# Altium PCB Switch_Matrix_32_2.PCBDOC (part 1 of 9)
Units mm, origin at the board's own origin, x right, y up, seen from the top; angles counter-clockwise.
Board outline 222.54 x 100 mm, 6 copper layers (L1, P2, L3, P4, L5, L6), stack 1.61 mm thick; 629 components, 583 nets, 2332 pads, 825 vias.
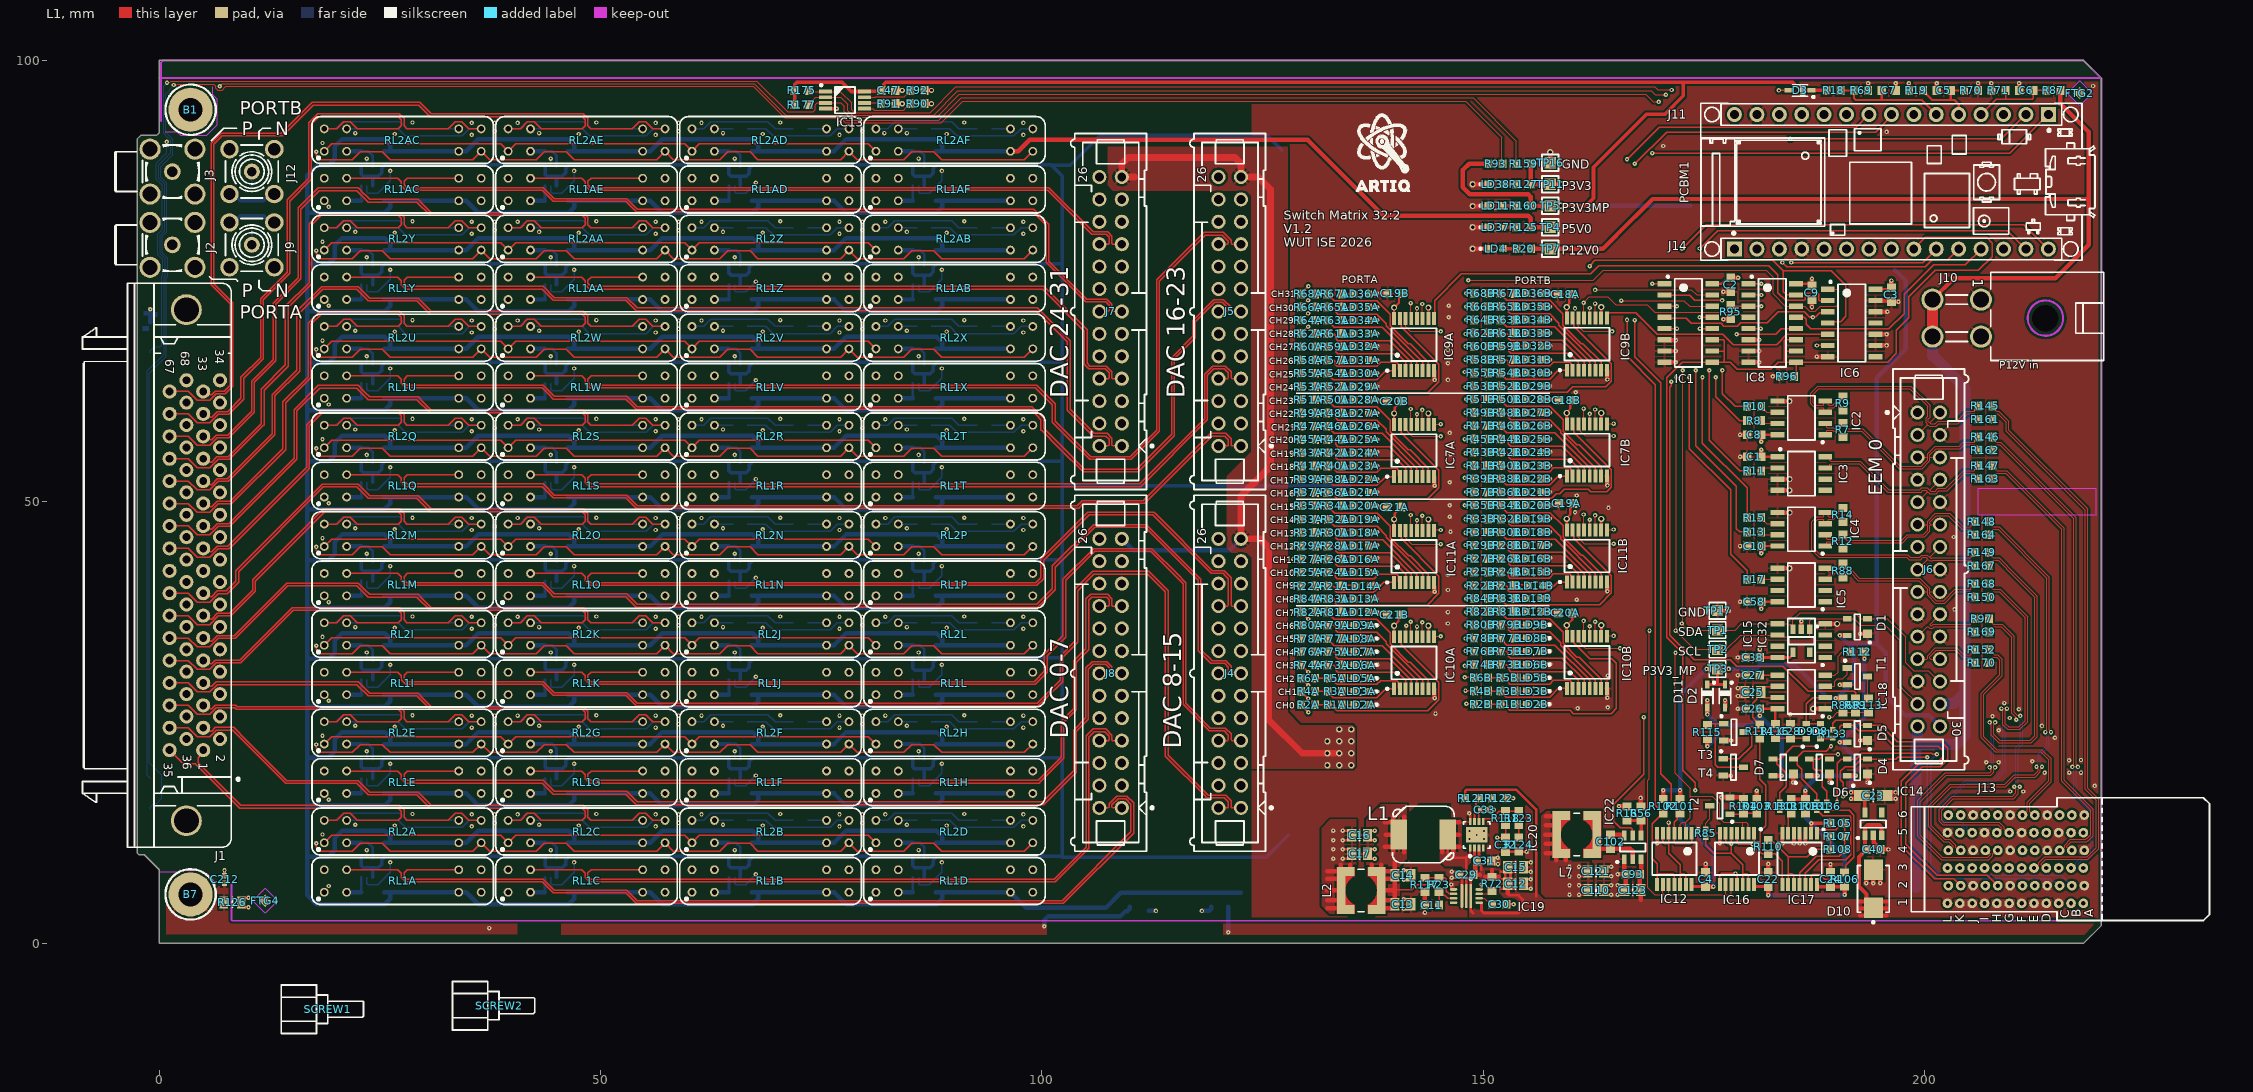
[diagram p0: L1 view]
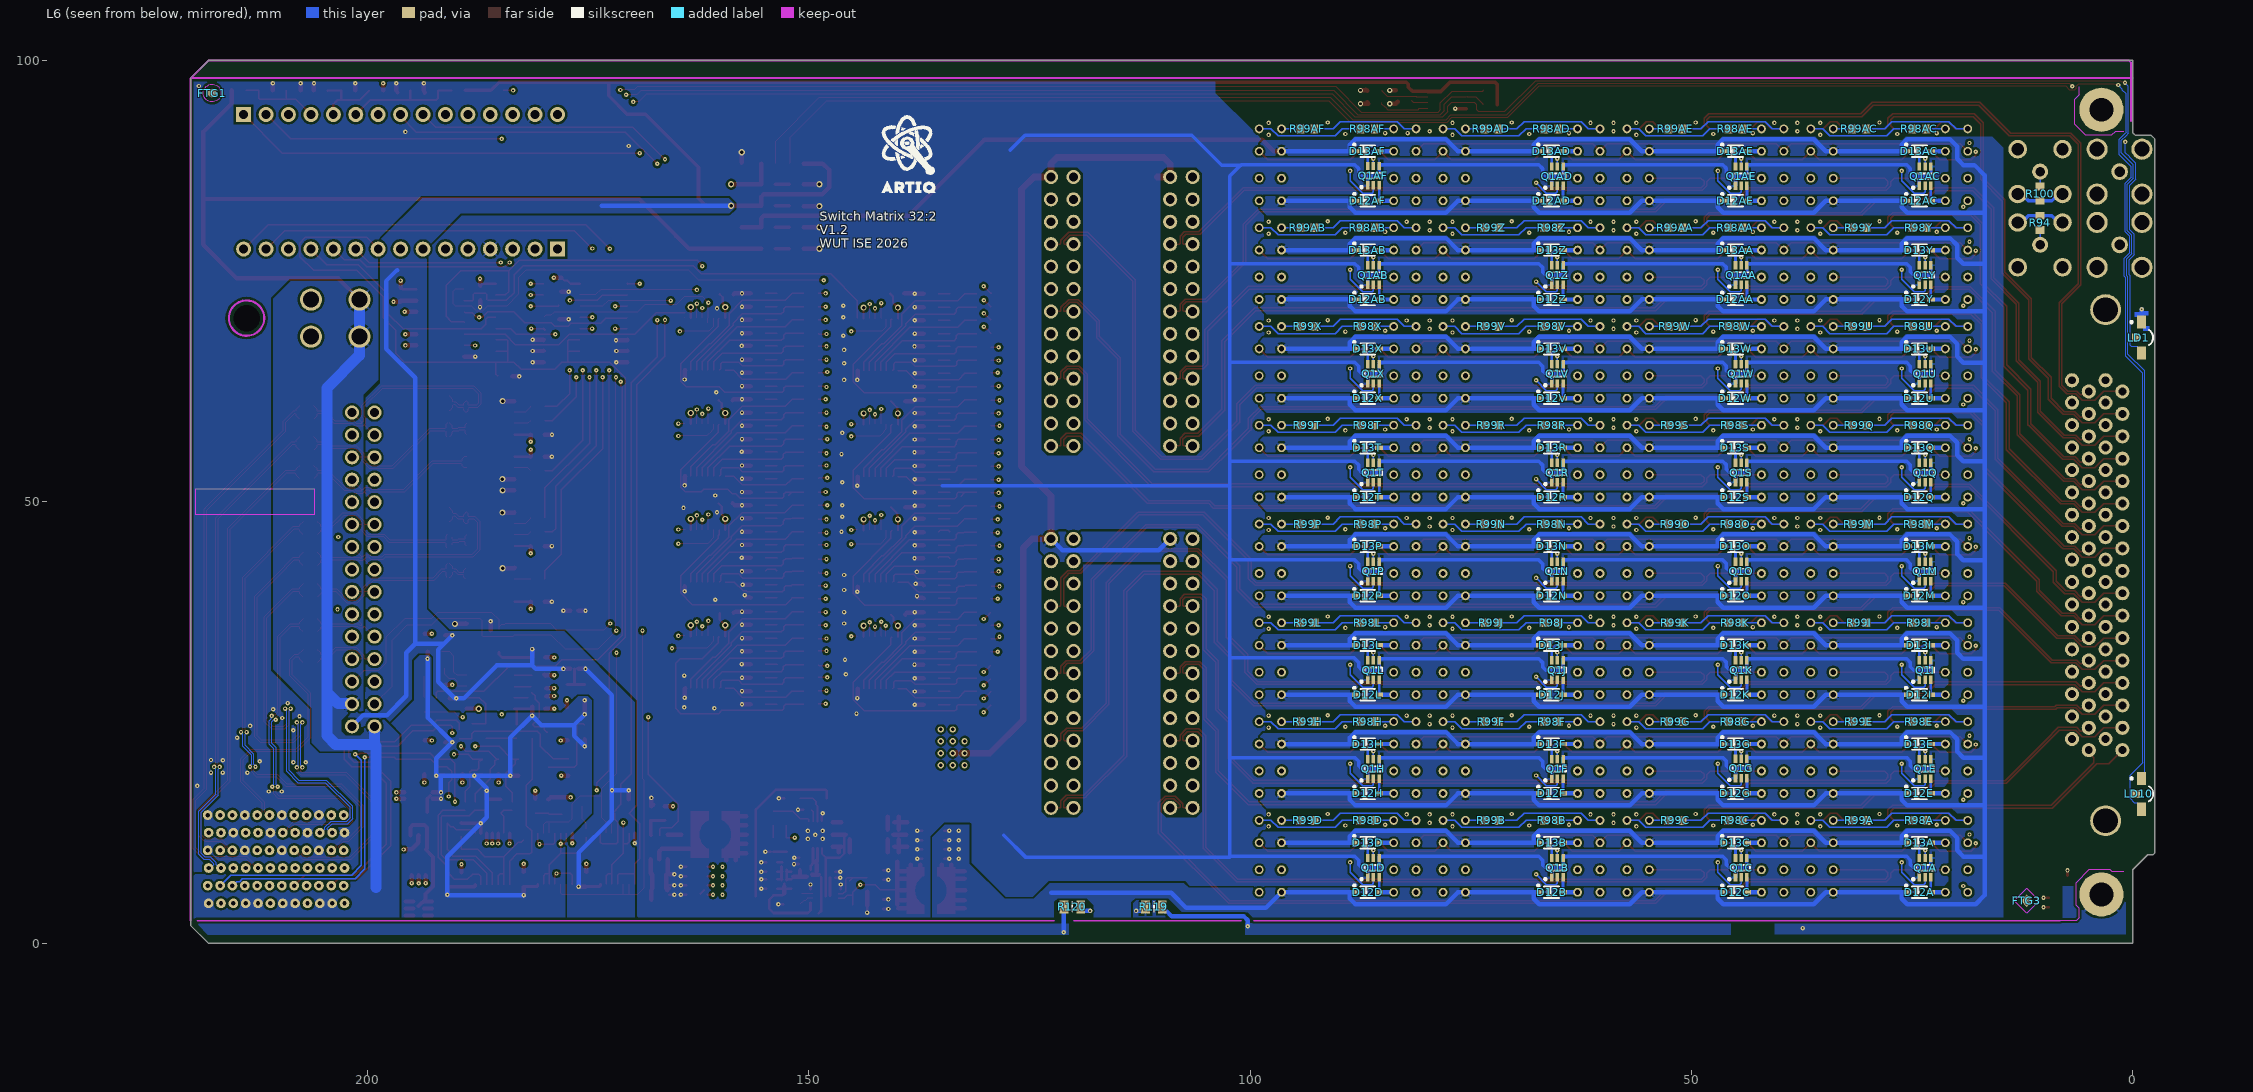
[diagram p1: L6 view, seen from below]
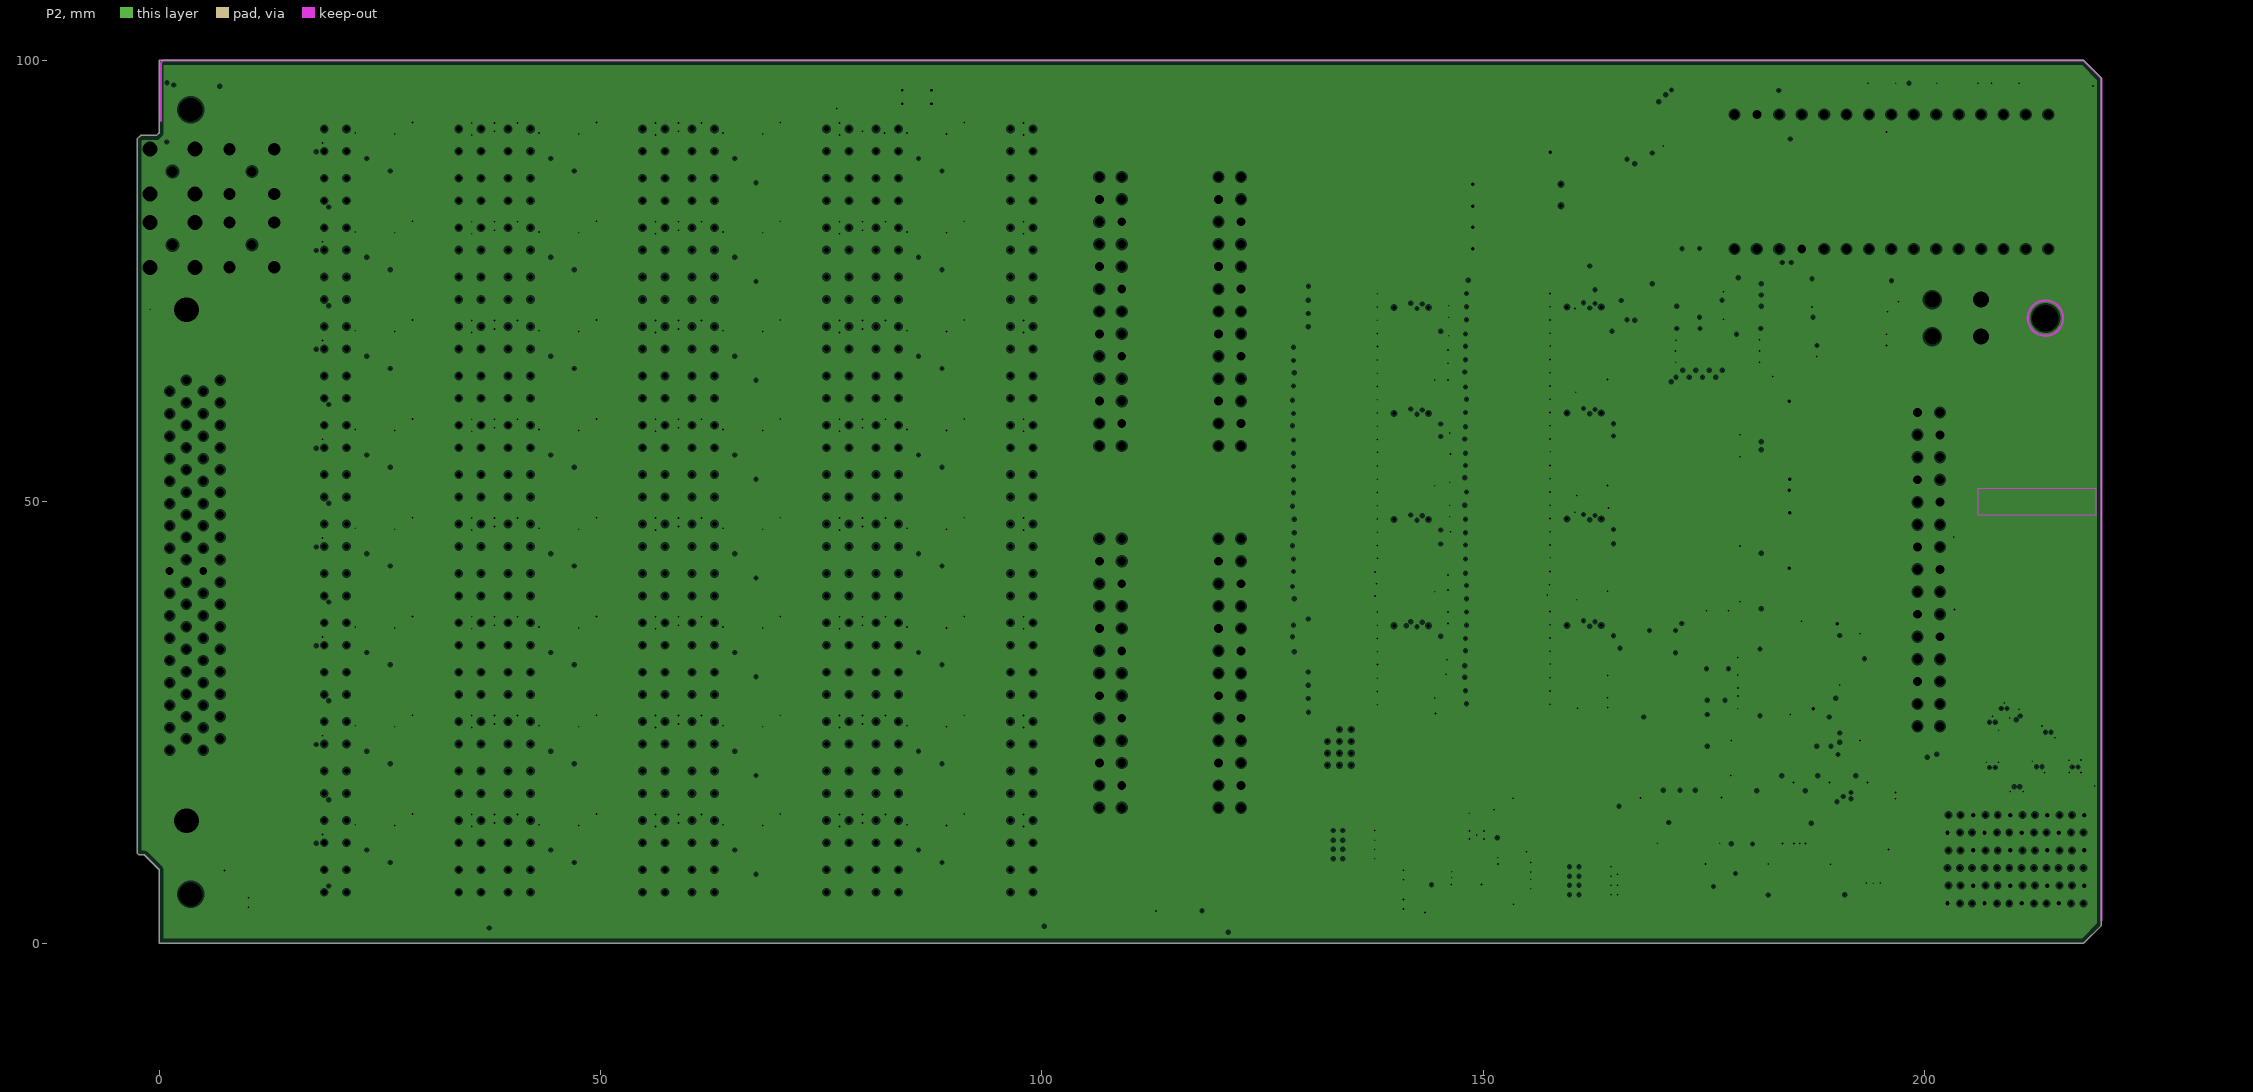
[diagram p2: P2, clearances drawn from the general rule]
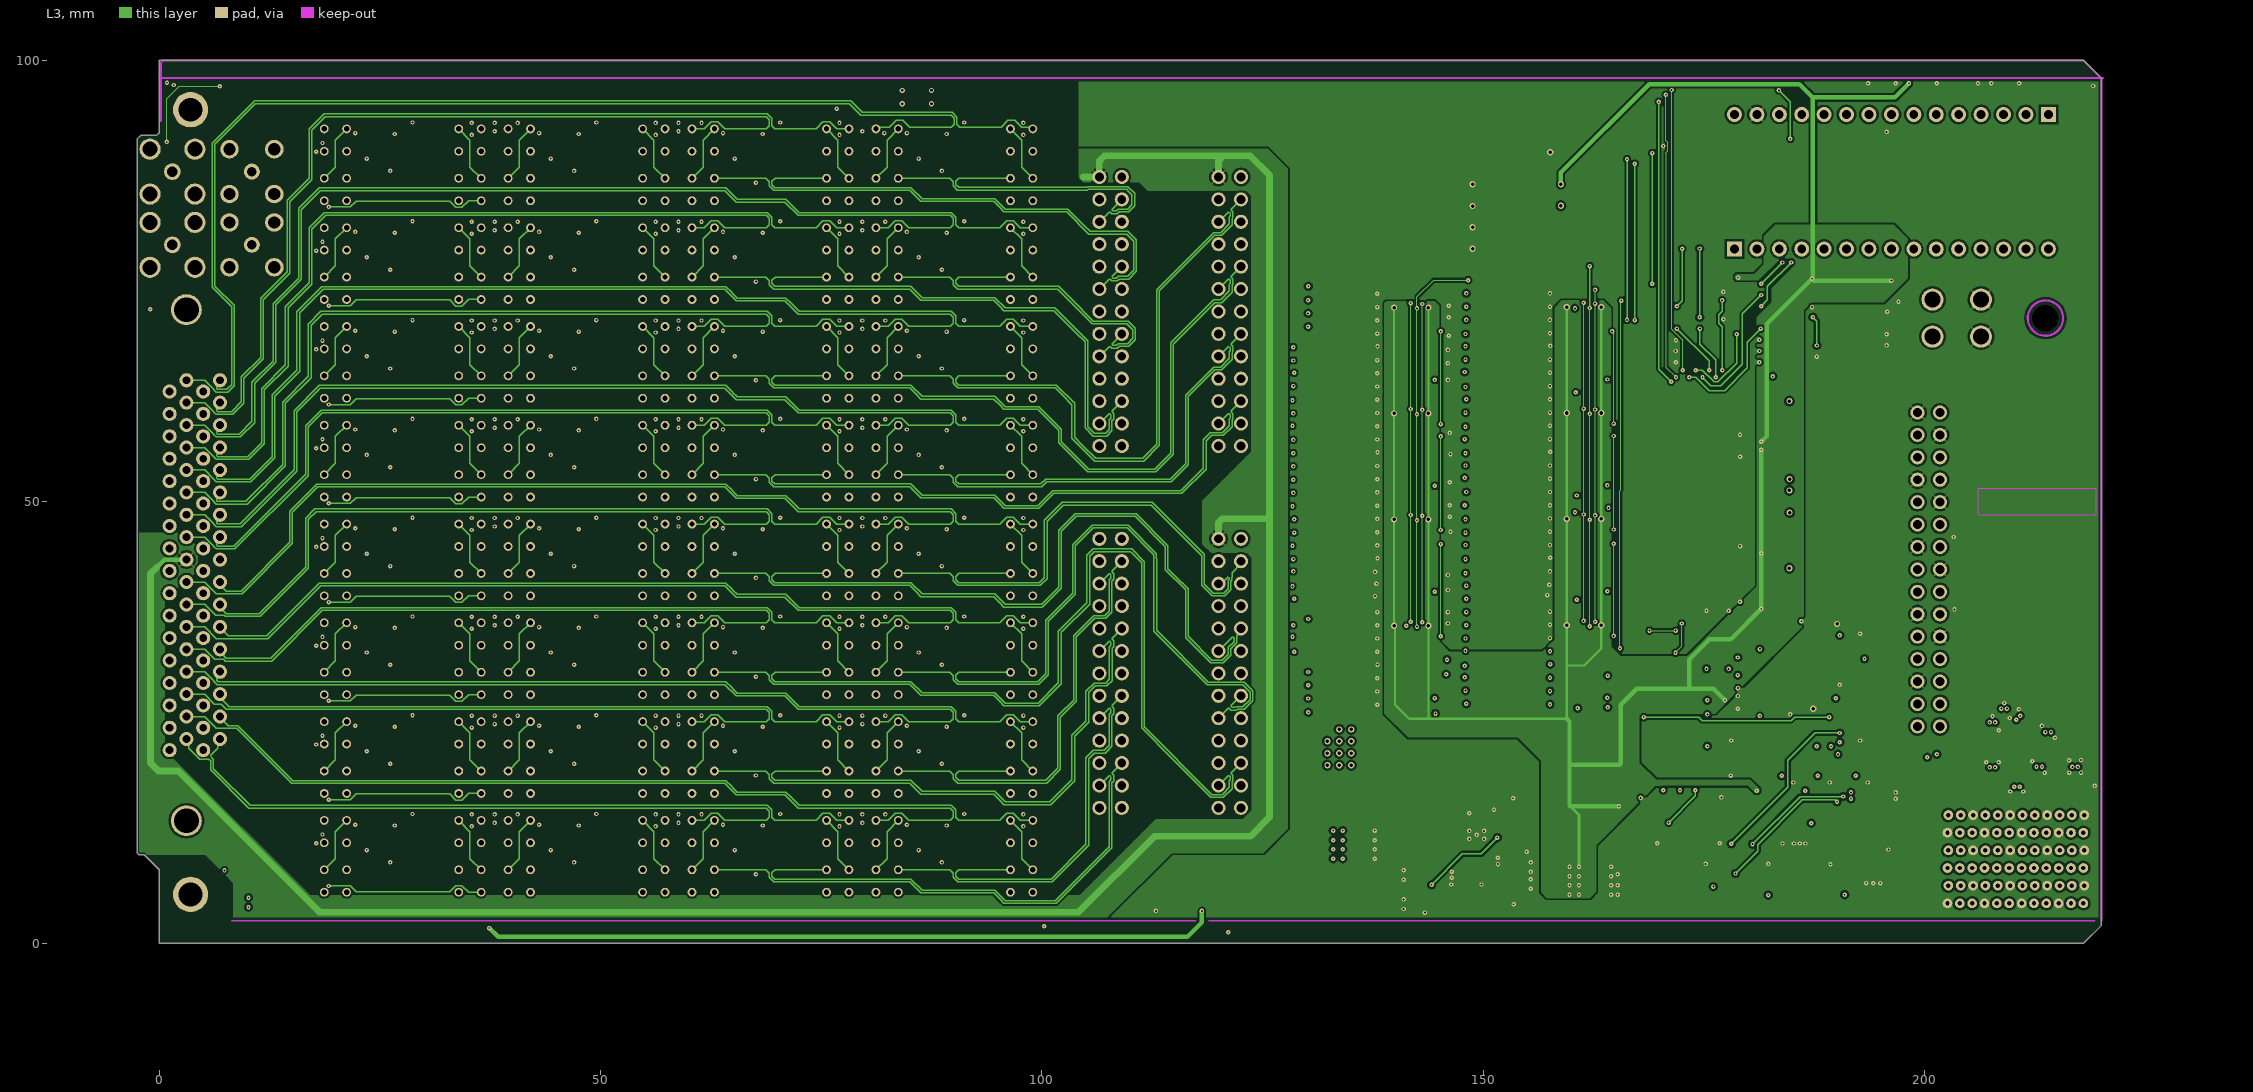
[diagram p3: L3]
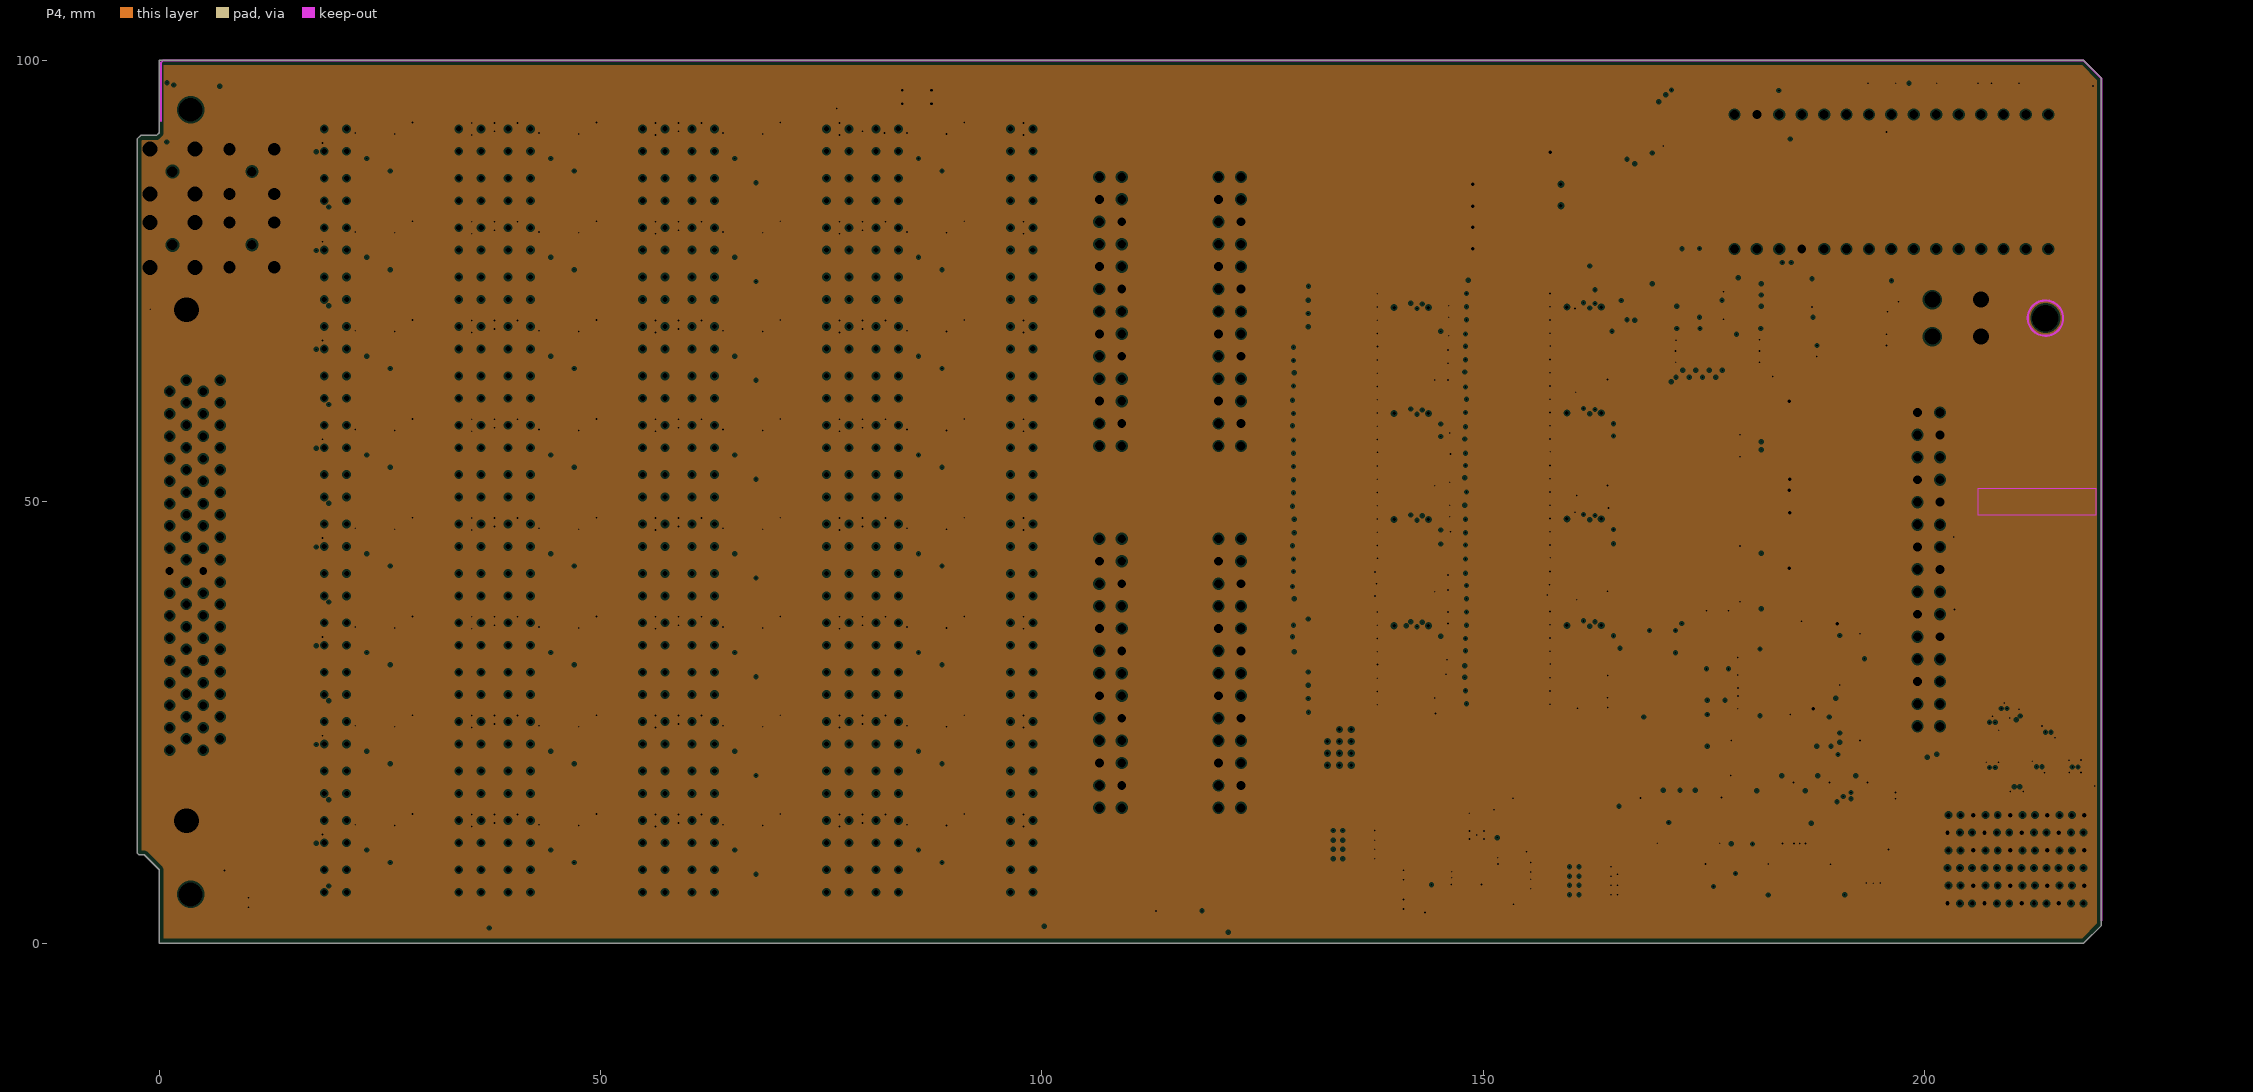
[diagram p4: P4, clearances drawn from the general rule]
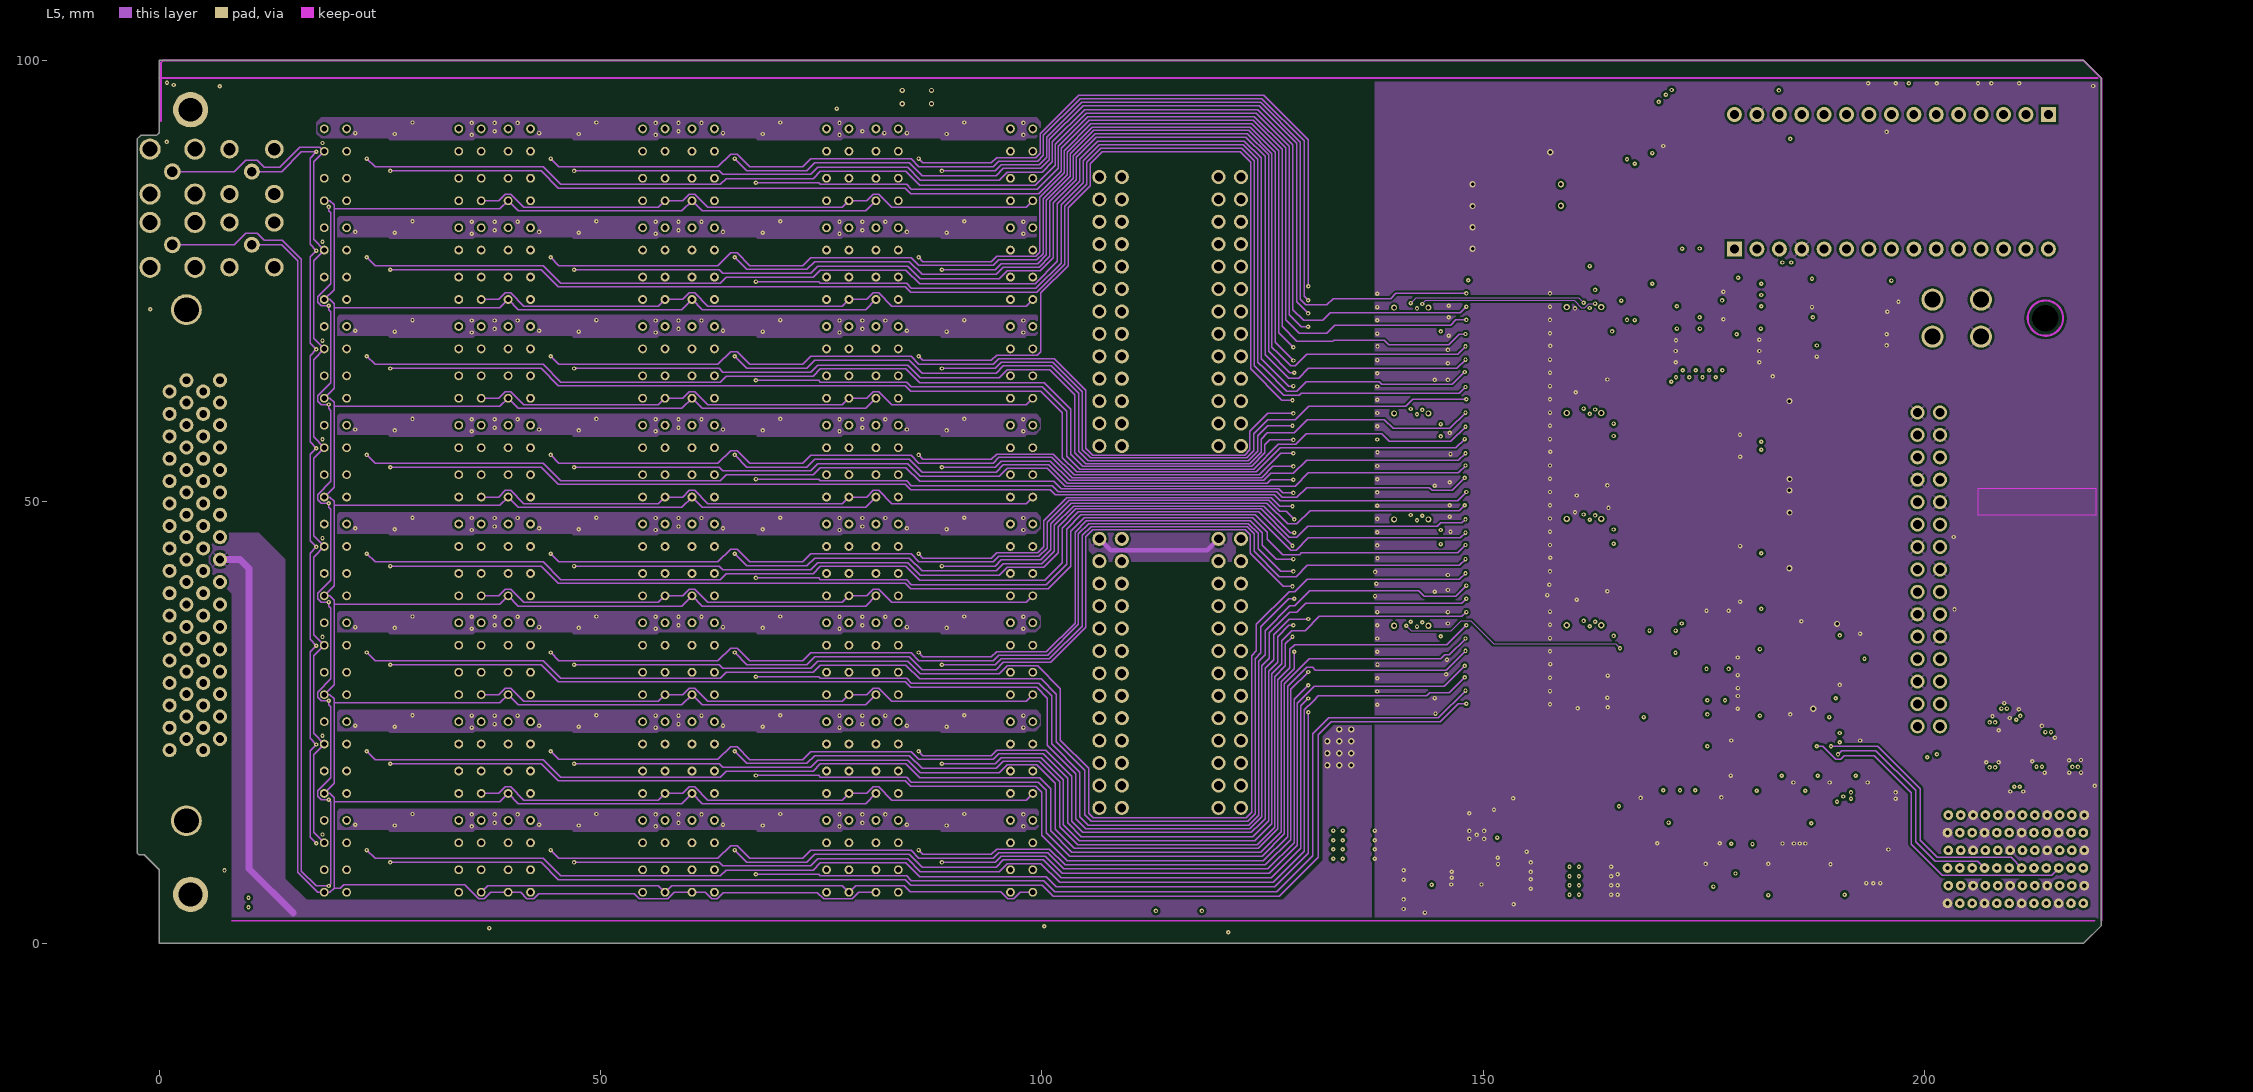
[diagram p5: L5]
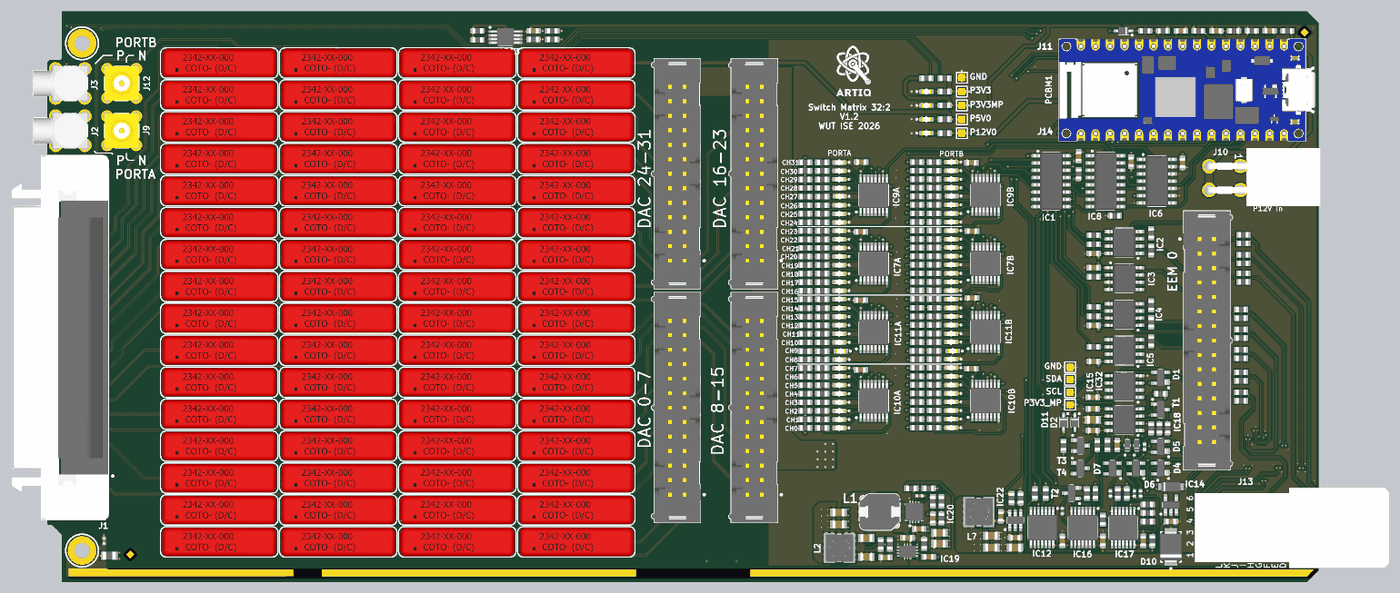
[diagram p13: 3D render of the assembled board from above, using the file's embedded part models]
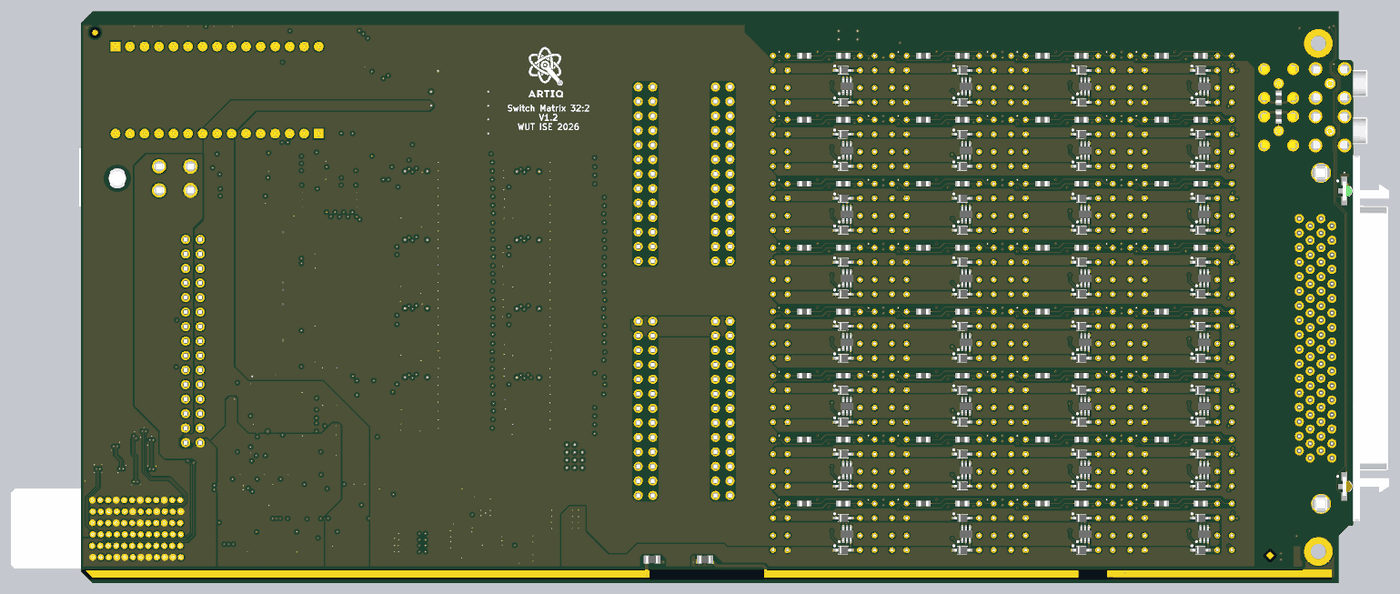
[diagram p14: 3D render of the assembled board from below, using the file's embedded part models]

## Layer stack, top to bottom
TopSolder: solder mask 0.01, Solder Resist, Dk 3.5
L1: signal copper 0.035
Dielectric1: core 0.2, FR-4, Dk 4.8
P2: plane copper 0.035, net GND
Dielectric 1: prepreg 0.4, PP-006, Dk 4.1
L3: signal copper 0.035
Dielectric 2: core 0.2, PP-006, Dk 4.1
P4: plane copper 0.035, net GND
Dielectric2: prepreg 0.4, Core-042, Dk 4.6
L5: signal copper 0.035
Dielectric3: core 0.2, FR-4, Dk 4.8
L6: signal copper 0.035
BottomSolder: solder mask 0.01, Solder Resist, Dk 3.5

## Board outline
-0.4,8.7 -1.7,10 -2.3,10 -2.5,10.2 -2.5,91.1 -2.1,91.5 -0.3,91.5 0,91.8 0,100 218.039,100 220.039,98 220.039,2 218.039,0 0,0 0,8.3

## Design rules (kind name [scope] priority, off if disabled: settings)
AcuteAngle [All] p1: minimum=4.50000000000000E+0001 checktracksonly=FALSE
BoardOutlineClearance [(OnSignal or OnPlane) and not (IsComponent)] p1: gap=0.254 ignorepadtopadclearanceinfootprint=FALSE except(0: Arc-SplitContinuation Track-SplitContinuation SMDPad-SplitContinuation THPad-SplitContinuation Via-SplitContinuation Fill-SplitContinuation Poly-SplitContinuation Region-SplitContinuation Text-SplitContinuation)
Clearance Clearance_LVDS [InNetClass('LVDS')] p1: gap=0.127 ignorepadtopadclearanceinfootprint=FALSE except(0.4: Arc-Poly Track-Poly SMDPad-Poly THPad-Poly Fill-Poly Poly-Poly)
Clearance Clearance_balancing [InNamedPolygon('balancing')] p2: gap=1.27 ignorepadtopadclearanceinfootprint=FALSE except(0.635: Via-Via Via-Fill Via-Poly Via-Region Via-Text Via-Hole)
Clearance [All] p3: gap=0.127 ignorepadtopadclearanceinfootprint=FALSE except(0: Arc-Hole Track-Hole SMDPad-Hole THPad-Hole Via-Hole Fill-Hole Poly-Hole Region-Hole Text-Hole; 0.254: Arc-Poly Track-Poly SMDPad-Poly THPad-Poly Via-Poly Fill-Poly Poly-Poly)
ComponentClearance ComponentClearance_EEprom [InComponent('IC32') vs InComponent('IC15')] p1: gap=-20 collisioncheckmode=3 verticalgap=-20 showdistances=FALSE
ComponentClearance [not ((IsFree and OnLayer('Mechanical13')) or (HasFootprint('PCBM_ARDUINO NANO RP2040'))) vs not ((IsFree and OnLayer('Mechanical13')) or (HasFootprint('PCBM_ARDUINO NANO RP2040')))] p2: gap=0.025 collisioncheckmode=3 verticalgap=0.025 showdistances=FALSE
DiffPairsRouting [All] p1: maxlimit=0.152 minlimit=0.127 mostfreqgap=0.152 toplayer_minwidth=0.127 toplayer_maxwidth=0.152 toplayer_prefwidth=0.152 midlayer1_minwidth=0.127 midlayer1_maxwidth=0.152 midlayer1_prefwidth=0.152 midlayer2_minwidth=0.127 midlayer2_maxwidth=0.152 midlayer2_prefwidth=0.152 bottomlayer_minwidth=0.127 bottomlayer_maxwidth=0.152 bottomlayer_prefwidth=0.152 maxuncoupledlength=12.7
FabricationTestPointUsage TestPointUsage [All] p1: valid=0 allowmultiple=FALSE
FabricationTestpoint Testpoint [All] p1: side=3 testpointundercomponent=TRUE minsize=1.016 maxsize=2.54 preferedsize=1.524 minholesize=0.508 maxholesize=1.016 preferedholesize=0.813 testpointgrid=0.025 allowsidetop=TRUE allowsidebottom=TRUE usegrid=TRUE gridtolerance=0
Height [All] p1: minheight=0 maxheight=40 prefheight=40
HoleSize [All] p1: absolutevalues=TRUE maxlimit=3.81 minlimit=0.025 maxpercent=80.000 minpercent=20.000
HoleToHoleClearance [All] p1: gap=0.025 allowstackedmicrovias=TRUE
MinimumSolderMaskSliver [All] p1: minsoldermaskwidth=0
PlaneClearance [All] p1: clearance=0.2
PlaneConnect [All] p1: planeconnectstyle=Direct reliefexpansion=0.508 reliefentries=4 reliefconductorwidth=0.254 reliefairgap=0.254
PolygonConnect PolygonConnect_Pressfit [HasFootprint('AMPHENOL_10052825-101LF')] p1: connectstyle=Direct reliefconductorwidth=0.254 reliefentries=4 polygonreliefangle="45 Angle" airgapwidth=0.254
PolygonConnect PolygonConnect_1 [All] p2: thpad.connectstyle=Relief thpad.reliefconductorwidth=0.254 thpad.reliefentries=4 thpad.polygonreliefangle="45 Angle" thpad.airgapwidth=0.254 smdpad.connectstyle=Relief smdpad.reliefconductorwidth=0.254 smdpad.reliefentries=4 smdpad.polygonreliefangle="90 Angle" smdpad.airgapwidth=0.254 via.connectstyle=Direct via.reliefconductorwidth=0.254 via.reliefentries=4 via.polygonreliefangle="45 Angle" via.airgapwidth=0.254
RoomDefinition Relay_channel31 [InComponentClass('Relay_channel31')] p1 off: confinementstyle=ConfineIn formatcopy=TRUE lockcomponents=FALSE outline 37.5,82.1 58.9,82.1 58.9,93.8 37.5,93.8
RoomDefinition U_DIOT_Connectors_P1_P6 [InComponentClass('U_DIOT_Connectors_P1_P6')] p2 off: confinementstyle=ConfineIn formatcopy=TRUE lockcomponents=FALSE outline 187.4,0.7 220.7,0.7 220.7,65.3 187.4,65.3
RoomDefinition Switch_Matrix_32_2 [InComponentClass('Switch_Matrix_32_2')] p3 off: confinementstyle=ConfineIn formatcopy=TRUE lockcomponents=FALSE outline 9.75,7.75 13.75,7.75 13.75,3.75 9.75,3.75
RoomDefinition Relay_channel32 [InComponentClass('Relay_channel32')] p4 off: confinementstyle=ConfineIn formatcopy=TRUE lockcomponents=FALSE outline 79.2,82.1 100.6,82.1 100.6,93.8 79.2,93.8
RoomDefinition Relay_channel30 [InComponentClass('Relay_channel30')] p5 off: confinementstyle=ConfineIn formatcopy=TRUE lockcomponents=FALSE outline 58.3,82.1 79.7,82.1 79.7,93.8 58.3,93.8
RoomDefinition Relay_channel29 [InComponentClass('Relay_channel29')] p6 off: confinementstyle=ConfineIn formatcopy=TRUE lockcomponents=FALSE outline 16.7,82.1 38,82.1 38,93.8 16.7,93.8
RoomDefinition Relay_channel28 [InComponentClass('Relay_channel28')] p7 off: confinementstyle=ConfineIn formatcopy=TRUE lockcomponents=FALSE outline 79.2,70.9 100.6,70.9 100.6,82.6 79.2,82.6
RoomDefinition Relay_channel27 [InComponentClass('Relay_channel27')] p8 off: confinementstyle=ConfineIn formatcopy=TRUE lockcomponents=FALSE outline 37.5,70.9 58.9,70.9 58.9,82.6 37.5,82.6
RoomDefinition Relay_channel26 [InComponentClass('Relay_channel26')] p9 off: confinementstyle=ConfineIn formatcopy=TRUE lockcomponents=FALSE outline 58.3,70.9 79.7,70.9 79.7,82.6 58.3,82.6
RoomDefinition Relay_channel25 [InComponentClass('Relay_channel25')] p10 off: confinementstyle=ConfineIn formatcopy=TRUE lockcomponents=FALSE outline 16.7,70.9 38,70.9 38,82.6 16.7,82.6
RoomDefinition Relay_channel24 [InComponentClass('Relay_channel24')] p11 off: confinementstyle=ConfineIn formatcopy=TRUE lockcomponents=FALSE outline 79.2,59.7 100.6,59.7 100.6,71.4 79.2,71.4
RoomDefinition Relay_channel23 [InComponentClass('Relay_channel23')] p12 off: confinementstyle=ConfineIn formatcopy=TRUE lockcomponents=FALSE outline 37.5,59.7 58.9,59.7 58.9,71.4 37.5,71.4
RoomDefinition Relay_channel22 [InComponentClass('Relay_channel22')] p13 off: confinementstyle=ConfineIn formatcopy=TRUE lockcomponents=FALSE outline 58.3,59.7 79.7,59.7 79.7,71.4 58.3,71.4
RoomDefinition Relay_channel21 [InComponentClass('Relay_channel21')] p14 off: confinementstyle=ConfineIn formatcopy=TRUE lockcomponents=FALSE outline 16.7,59.7 38,59.7 38,71.4 16.7,71.4
RoomDefinition Relay_channel20 [InComponentClass('Relay_channel20')] p15 off: confinementstyle=ConfineIn formatcopy=TRUE lockcomponents=FALSE outline 79.2,48.5 100.6,48.5 100.6,60.2 79.2,60.2
RoomDefinition Relay_channel19 [InComponentClass('Relay_channel19')] p16 off: confinementstyle=ConfineIn formatcopy=TRUE lockcomponents=FALSE outline 37.5,48.5 58.9,48.5 58.9,60.2 37.5,60.2
RoomDefinition Relay_channel18 [InComponentClass('Relay_channel18')] p17 off: confinementstyle=ConfineIn formatcopy=TRUE lockcomponents=FALSE outline 58.3,48.5 79.7,48.5 79.7,60.2 58.3,60.2
RoomDefinition Relay_channel17 [InComponentClass('Relay_channel17')] p18 off: confinementstyle=ConfineIn formatcopy=TRUE lockcomponents=FALSE outline 16.7,48.5 38,48.5 38,60.2 16.7,60.2
RoomDefinition Relay_channel16 [InComponentClass('Relay_channel16')] p19 off: confinementstyle=ConfineIn formatcopy=TRUE lockcomponents=FALSE outline 79.2,37.3 100.6,37.3 100.6,49 79.2,49
RoomDefinition Relay_channel15 [InComponentClass('Relay_channel15')] p20 off: confinementstyle=ConfineIn formatcopy=TRUE lockcomponents=FALSE outline 37.5,37.3 58.9,37.3 58.9,49 37.5,49
RoomDefinition Relay_channel14 [InComponentClass('Relay_channel14')] p21 off: confinementstyle=ConfineIn formatcopy=TRUE lockcomponents=FALSE outline 58.3,37.3 79.7,37.3 79.7,49 58.3,49
RoomDefinition Relay_channel13 [InComponentClass('Relay_channel13')] p22 off: confinementstyle=ConfineIn formatcopy=TRUE lockcomponents=FALSE outline 16.7,37.3 38,37.3 38,49 16.7,49
RoomDefinition Relay_channel12 [InComponentClass('Relay_channel12')] p23 off: confinementstyle=ConfineIn formatcopy=TRUE lockcomponents=FALSE outline 79.2,26.1 100.6,26.1 100.6,37.9 79.2,37.9
RoomDefinition Relay_channel11 [InComponentClass('Relay_channel11')] p24 off: confinementstyle=ConfineIn formatcopy=TRUE lockcomponents=FALSE outline 37.5,26.1 58.9,26.1 58.9,37.9 37.5,37.9
RoomDefinition Relay_channel10 [InComponentClass('Relay_channel10')] p25 off: confinementstyle=ConfineIn formatcopy=TRUE lockcomponents=FALSE outline 58.3,26.1 79.7,26.1 79.7,37.9 58.3,37.9
RoomDefinition Relay_channel9 [InComponentClass('Relay_channel9')] p26 off: confinementstyle=ConfineIn formatcopy=TRUE lockcomponents=FALSE outline 16.7,26.1 38,26.1 38,37.9 16.7,37.9
RoomDefinition Relay_channel8 [InComponentClass('Relay_channel8')] p27 off: confinementstyle=ConfineIn formatcopy=TRUE lockcomponents=FALSE outline 79.2,14.9 100.6,14.9 100.6,26.7 79.2,26.7
RoomDefinition Relay_channel7 [InComponentClass('Relay_channel7')] p28 off: confinementstyle=ConfineIn formatcopy=TRUE lockcomponents=FALSE outline 37.5,14.9 58.9,14.9 58.9,26.7 37.5,26.7
RoomDefinition Relay_channel6 [InComponentClass('Relay_channel6')] p29 off: confinementstyle=ConfineIn formatcopy=TRUE lockcomponents=FALSE outline 58.3,14.9 79.7,14.9 79.7,26.7 58.3,26.7
RoomDefinition Relay_channel5 [InComponentClass('Relay_channel5')] p30 off: confinementstyle=ConfineIn formatcopy=TRUE lockcomponents=FALSE outline 16.7,14.9 38,14.9 38,26.7 16.7,26.7
RoomDefinition Relay_channel4 [InComponentClass('Relay_channel4')] p31 off: confinementstyle=ConfineIn formatcopy=TRUE lockcomponents=FALSE outline 79.2,3.7 100.6,3.7 100.6,15.5 79.2,15.5
RoomDefinition Relay_channel3 [InComponentClass('Relay_channel3')] p32 off: confinementstyle=ConfineIn formatcopy=TRUE lockcomponents=FALSE outline 37.5,3.7 58.9,3.7 58.9,15.5 37.5,15.5
RoomDefinition Relay_channel2 [InComponentClass('Relay_channel2')] p33 off: confinementstyle=ConfineIn formatcopy=TRUE lockcomponents=FALSE outline 58.3,3.7 79.7,3.7 79.7,15.5 58.3,15.5
RoomDefinition Relay_channel1 [InComponentClass('Relay_channel1')] p34 off: confinementstyle=ConfineIn formatcopy=TRUE lockcomponents=FALSE outline 16.7,3.7 38,3.7 38,15.5 16.7,15.5
RoomDefinition CTRLB [InComponentClass('CTRLB')] p35 off: confinementstyle=ConfineIn formatcopy=TRUE lockcomponents=FALSE outline 148,26.05 165.5,26.05 165.5,74.6 148,74.6
RoomDefinition CTRLA [InComponentClass('CTRLA')] p36 off: confinementstyle=ConfineIn formatcopy=TRUE lockcomponents=FALSE outline 128.425,26 145.925,26 145.925,74.55 128.425,74.55
RoomDefinition Overlapping [InComponentClass('Overlapping')] p37 off: confinementstyle=ConfineIn formatcopy=TRUE lockcomponents=FALSE outline 104.075,-131.575 -5.375,-131.575 -5.375,-111.025 104.075,-111.025
RoomDefinition U_Switch_Matrix_32_2_Supply [InComponentClass('U_Switch_Matrix_32_2_Supply')] p38 off: confinementstyle=ConfineIn formatcopy=TRUE lockcomponents=FALSE outline 172.2,17.6 207.4,17.6 207.4,1.7 172.2,1.7
RoomDefinition U_Switch_Matrix_32_2_EEM [InComponentClass('U_Switch_Matrix_32_2_EEM')] p39 off: confinementstyle=ConfineIn formatcopy=TRUE lockcomponents=FALSE outline 214,14.7 159.9,14.7 159.9,90.2 214,90.2
RoutingVias RoutingVias_HPWR [InNetClass('Hpower')] p1: holewidth=0.4 width=0.7 viastyle="Through Hole" minholewidth=0.2 minwidth=0.4 maxholewidth=0.711 maxwidth=1.27
RoutingVias [All] p2: holewidth=0.2 width=0.5 viastyle="Through Hole" minholewidth=0.2 minwidth=0.4 maxholewidth=0.711 maxwidth=1.27 useviatemplates=TRUE viatemplateguid#1={0001295C-FF79-4C27-8418-7EFAEB5757D8} viatemplateguid#2={13926838-4983-4471-9819-F5821E9D87EE} viatemplateguid#3={F834FD54-37C4-4248-B22B-F1AB9E1D42DF} viatemplatename#1=v50h20m0mx0 viatemplatename#2=v60h30m0mx0 viatemplatename#3=v70h40m0mx0
SilkToSilkClearance [All] p1: silktosilkclearance=0
SilkToSolderMaskClearance SilkscreenOverComponentPads [IsPad] p1: minsilkscreentomaskgap=0 clearancetoexposedcopper=TRUE
SolderMaskExpansion [All] p1: expansion=0.051 istentingtop=FALSE
SupplyNets "Schematic Supply Nets_9" [InNet('P5V0A')] p1: voltage=0.000
SupplyNets "Schematic Supply Nets_8" [InNet('STRIP1')] p2: voltage=0.000
SupplyNets "Schematic Supply Nets_7" [InNet('P3V3_DIOT')] p3: voltage=0.000
SupplyNets "Schematic Supply Nets_6" [InNet('N13V0_SCSI')] p4: voltage=0.000
SupplyNets "Schematic Supply Nets_5" [InNet('P3V3_MP')] p5: voltage=0.000
SupplyNets "Schematic Supply Nets_4" [InNet('P3V3')] p6: voltage=0.000
SupplyNets "Schematic Supply Nets_3" [InNet('P12V0')] p7: voltage=0.000
SupplyNets "Schematic Supply Nets_2" [InNet('GND')] p8: voltage=0.000
SupplyNets "Schematic Supply Nets" [InNet('P13V0_SCSI')] p9: voltage=0.000
ViasUnderSMD ViasUnderSMD_allow [HasFootprint('QFN50P300X300X80-17N-S175') or  HasFootprint('SOP50P490X110-11N-R168X198')  or  HasFootprint('SON50P300X300X80-11N-R175X248') or HasFootprint('SON50P200X300X80-11N-R94X250') or HasFootprint('CAPMP3216X180N')   or HasFootprint('SON65P200X200X80-7N-R65X145') or HasFootprint('SON45P300X300X80-13N-R175X248') or HasFootprint('SON50P300X300X80-9N-R175X248')] p1: allowed=TRUE
ViasUnderSMD [All] p2: allowed=FALSE
Width Width_HPWR [InNetClass('Hpower')] p1: maxlimit=2 minlimit=0.254 preferedwidth=0.508
Width [All] p2: maxlimit=1.27 minlimit=0.127 preferedwidth=0.127
18 further rules are at their usual default settings.

## Classes and differential pairs
net class ESD_STRIP: STRIP1 STRIP2 STRIP3
net class BP_IO.LVDS_P[0..7]: BP_IO.LVDS_P0 BP_IO.LVDS_P1 BP_IO.LVDS_P2 BP_IO.LVDS_P3 BP_IO.LVDS_P4 BP_IO.LVDS_P5 BP_IO.LVDS_P6 BP_IO.LVDS_P7
net class BP_IO.LVDS_N[0..7]: BP_IO.LVDS_N0 BP_IO.LVDS_N1 BP_IO.LVDS_N2 BP_IO.LVDS_N3 BP_IO.LVDS_N4 BP_IO.LVDS_N5 BP_IO.LVDS_N6 BP_IO.LVDS_N7
component class Overlapping: J13
channel class Switch_Matrix_CTRL: CTRLA CTRLB
net class PWR: P12V0
component class U_DIOT_Connectors_P1_P6: C23 C24 C25 C26 C27 C28 C40 D5 D6 D7 D8 D9 D11 IC14 IC16 IC17 IC18 J13 R85 R97 R103 R104 R105 R106 R107 R108 R109 R110 R111 R112 R113 R114 R115 R116 R130 R131 R133 R136 R145 R146 R147 R148 R149 R150 R152 R161 R162 R163 R164 R167 R168 R169 R170 T1 T2 T3 T4
component class CTRLB: C18B C19B C20B C21B IC7B IC9B IC10B IC11B LD2B LD3B LD5B LD6B LD7B LD8B LD9B LD12B LD13B LD14B LD15B LD16B LD17B LD18B LD19B LD20B LD21B LD22B LD23B LD24B LD25B LD26B LD27B LD28B LD29B LD30B LD31B LD32B LD33B LD34B LD35B LD36B R1B R2B R3B R4B R5B R6B R21B R22B R24B R25B R26B R27B R28B R29B R30B R31B R32B R33B R34B R35B R36B R37B R38B R39B R40B R41B R42B R43B R44B R45B R46B R47B R48B R49B R50B R51B R52B R53B R54B R55B R57B R58B R59B R60B R61B R62B R63B R64B R65B R66B R67B R68B R73B R74B R75B R76B R77B R78B R79B R80B R81B R82B R83B R84B
component class CTRLA: C18A C19A C20A C21A IC7A IC9A IC10A IC11A LD2A LD3A LD5A LD6A LD7A LD8A LD9A LD12A LD13A LD14A LD15A LD16A LD17A LD18A LD19A LD20A LD21A LD22A LD23A LD24A LD25A LD26A LD27A LD28A LD29A LD30A LD31A LD32A LD33A LD34A LD35A LD36A R1A R2A R3A R4A R5A R6A R21A R22A R24A R25A R26A R27A R28A R29A R30A R31A R32A R33A R34A R35A R36A R37A R38A R39A R40A R41A R42A R43A R44A R45A R46A R47A R48A R49A R50A R51A R52A R53A R54A R55A R57A R58A R59A R60A R61A R62A R63A R64A R65A R66A R67A R68A R73A R74A R75A R76A R77A R78A R79A R80A R81A R82A R83A R84A
net class DAC_IN_P[32..1]: DAC_IN_P1 DAC_IN_P2 DAC_IN_P3 DAC_IN_P4 DAC_IN_P5 DAC_IN_P6 DAC_IN_P7 DAC_IN_P8 DAC_IN_P9 DAC_IN_P10 DAC_IN_P11 DAC_IN_P12 DAC_IN_P13 DAC_IN_P14 DAC_IN_P15 DAC_IN_P16 DAC_IN_P17 DAC_IN_P18 DAC_IN_P19 DAC_IN_P20 DAC_IN_P21 DAC_IN_P22 DAC_IN_P23 DAC_IN_P24 DAC_IN_P25 DAC_IN_P26 DAC_IN_P27 DAC_IN_P28 DAC_IN_P29 DAC_IN_P30 DAC_IN_P31 DAC_IN_P32
net class DAC_IN_N[32..1]: DAC_IN_N1 DAC_IN_N2 DAC_IN_N3 DAC_IN_N4 DAC_IN_N5 DAC_IN_N6 DAC_IN_N7 DAC_IN_N8 DAC_IN_N9 DAC_IN_N10 DAC_IN_N11 DAC_IN_N12 DAC_IN_N13 DAC_IN_N14 DAC_IN_N15 DAC_IN_N16 DAC_IN_N17 DAC_IN_N18 DAC_IN_N19 DAC_IN_N20 DAC_IN_N21 DAC_IN_N22 DAC_IN_N23 DAC_IN_N24 DAC_IN_N25 DAC_IN_N26 DAC_IN_N27 DAC_IN_N28 DAC_IN_N29 DAC_IN_N30 DAC_IN_N31 DAC_IN_N32
channel class Relay_channel: Relay_channel1 Relay_channel2 Relay_channel3 Relay_channel4 Relay_channel5 Relay_channel6 Relay_channel7 Relay_channel8 Relay_channel9 Relay_channel10 Relay_channel11 Relay_channel12 Relay_channel13 Relay_channel14 Relay_channel15 Relay_channel16 Relay_channel17 Relay_channel18 Relay_channel19 Relay_channel20 Relay_channel21 Relay_channel22 Relay_channel23 Relay_channel24 Relay_channel25 Relay_channel26 Relay_channel27 Relay_channel28 Relay_channel29 Relay_channel30 Relay_channel31 Relay_channel32
component class Relay_channel32: D12AF D13AF Q1AF R98AF R99AF RL1AF RL2AF
component class Relay_channel31: D12AE D13AE Q1AE R98AE R99AE RL1AE RL2AE
component class Relay_channel30: D12AD D13AD Q1AD R98AD R99AD RL1AD RL2AD
component class Relay_channel29: D12AC D13AC Q1AC R98AC R99AC RL1AC RL2AC
component class Relay_channel28: D12AB D13AB Q1AB R98AB R99AB RL1AB RL2AB
component class Relay_channel27: D12AA D13AA Q1AA R98AA R99AA RL1AA RL2AA
component class Relay_channel26: D12Z D13Z Q1Z R98Z R99Z RL1Z RL2Z
component class Relay_channel25: D12Y D13Y Q1Y R98Y R99Y RL1Y RL2Y
component class Relay_channel24: D12X D13X Q1X R98X R99X RL1X RL2X
component class Relay_channel23: D12W D13W Q1W R98W R99W RL1W RL2W
component class Relay_channel22: D12V D13V Q1V R98V R99V RL1V RL2V
component class Relay_channel21: D12U D13U Q1U R98U R99U RL1U RL2U
component class Relay_channel20: D12T D13T Q1T R98T R99T RL1T RL2T
component class Relay_channel19: D12S D13S Q1S R98S R99S RL1S RL2S
component class Relay_channel18: D12R D13R Q1R R98R R99R RL1R RL2R
component class Relay_channel17: D12Q D13Q Q1Q R98Q R99Q RL1Q RL2Q
component class Relay_channel16: D12P D13P Q1P R98P R99P RL1P RL2P
component class Relay_channel15: D12O D13O Q1O R98O R99O RL1O RL2O
component class Relay_channel14: D12N D13N Q1N R98N R99N RL1N RL2N
component class Relay_channel13: D12M D13M Q1M R98M R99M RL1M RL2M
component class Relay_channel12: D12L D13L Q1L R98L R99L RL1L RL2L
component class Relay_channel11: D12K D13K Q1K R98K R99K RL1K RL2K
component class Relay_channel10: D12J D13J Q1J R98J R99J RL1J RL2J
component class Relay_channel9: D12I D13I Q1I R98I R99I RL1I RL2I
component class Relay_channel8: D12H D13H Q1H R98H R99H RL1H RL2H
component class Relay_channel7: D12G D13G Q1G R98G R99G RL1G RL2G
component class Relay_channel6: D12F D13F Q1F R98F R99F RL1F RL2F
component class Relay_channel5: D12E D13E Q1E R98E R99E RL1E RL2E
component class Relay_channel4: D12D D13D Q1D R98D R99D RL1D RL2D
component class Relay_channel3: D12C D13C Q1C R98C R99C RL1C RL2C
component class Relay_channel2: D12B D13B Q1B R98B R99B RL1B RL2B
component class Relay_channel1: D12A D13A Q1A R98A R99A RL1A RL2A
net class DAC_OUT_P[32..1]: DAC_OUT_P1 DAC_OUT_P2 DAC_OUT_P3 DAC_OUT_P4 DAC_OUT_P5 DAC_OUT_P6 DAC_OUT_P7 DAC_OUT_P8 DAC_OUT_P9 DAC_OUT_P10 DAC_OUT_P11 DAC_OUT_P12 DAC_OUT_P13 DAC_OUT_P14 DAC_OUT_P15 DAC_OUT_P16 DAC_OUT_P17 DAC_OUT_P18 DAC_OUT_P19 DAC_OUT_P20 DAC_OUT_P21 DAC_OUT_P22 DAC_OUT_P23 DAC_OUT_P24 DAC_OUT_P25 DAC_OUT_P26 DAC_OUT_P27 DAC_OUT_P28 DAC_OUT_P29 DAC_OUT_P30 DAC_OUT_P31 DAC_OUT_P32
net class DAC_OUT_N[32..1]: DAC_OUT_N1 DAC_OUT_N2 DAC_OUT_N3 DAC_OUT_N4 DAC_OUT_N5 DAC_OUT_N6 DAC_OUT_N7 DAC_OUT_N8 DAC_OUT_N9 DAC_OUT_N10 DAC_OUT_N11 DAC_OUT_N12 DAC_OUT_N13 DAC_OUT_N14 DAC_OUT_N15 DAC_OUT_N16 DAC_OUT_N17 DAC_OUT_N18 DAC_OUT_N19 DAC_OUT_N20 DAC_OUT_N21 DAC_OUT_N22 DAC_OUT_N23 DAC_OUT_N24 DAC_OUT_N25 DAC_OUT_N26 DAC_OUT_N27 DAC_OUT_N28 DAC_OUT_N29 DAC_OUT_N30 DAC_OUT_N31 DAC_OUT_N32
component class U_Switch_Matrix_32_2_EEM: C1 C2 C3 C4 C8 C9 C10 C38 C58 D1 IC1 IC2 IC3 IC4 IC5 IC6 IC8 IC12 IC13 IC15 IC32 J6 LD10 R7 R8 R9 R10 R11 R12 R13 R14 R15 R17 R86 R88 R89 R90 R91 R92 R93 R101 R102 R175 R177 TP1 TP2 TP3
component class Switch_Matrix_32_2: B1 B7 C5 C6 C7 C212 D3 FTG1 FTG2 FTG3 FTG4 J1 J2 J3 J4 J5 J7 J8 J9 J11 J12 J14 PCBM1 R18 R19 R69 R70 R71 R87 R94 R95 R96 R100 R119 R120 R126 SCREW1 SCREW2
net class Hpower: P3V3
component class U_Switch_Matrix_32_2_Supply: C11 C12 C13 C14 C15 C16 C17 C29 C30 C31 C32 C33 C93 C102 C110 C121 C123 D2 D10 IC19 IC20 IC22 J10 L1 L2 L7 LD1 LD4 LD11 LD37 LD38 R16 R20 R23 R56 R117 R118 R121 R122 R123 R124 R125 R127 R159 R160 TP4 TP5 TP7 TP11 TP16
differential pair DAC_OUT32: +DAC_OUT_P32 -DAC_OUT_N32
differential pair DAC_OUT31: +DAC_OUT_P31 -DAC_OUT_N31
differential pair DAC_OUT30: +DAC_OUT_P30 -DAC_OUT_N30
differential pair DAC_OUT29: +DAC_OUT_P29 -DAC_OUT_N29
differential pair DAC_OUT28: +DAC_OUT_P28 -DAC_OUT_N28
differential pair DAC_OUT27: +DAC_OUT_P27 -DAC_OUT_N27
differential pair DAC_OUT26: +DAC_OUT_P26 -DAC_OUT_N26
differential pair DAC_OUT25: +DAC_OUT_P25 -DAC_OUT_N25
differential pair DAC_OUT24: +DAC_OUT_P24 -DAC_OUT_N24
differential pair DAC_OUT23: +DAC_OUT_P23 -DAC_OUT_N23
differential pair DAC_OUT22: +DAC_OUT_P22 -DAC_OUT_N22
differential pair DAC_OUT21: +DAC_OUT_P21 -DAC_OUT_N21
differential pair DAC_OUT20: +DAC_OUT_P20 -DAC_OUT_N20
differential pair DAC_OUT19: +DAC_OUT_P19 -DAC_OUT_N19
differential pair DAC_OUT18: +DAC_OUT_P18 -DAC_OUT_N18
differential pair DAC_OUT17: +DAC_OUT_P17 -DAC_OUT_N17
differential pair DAC_OUT16: +DAC_OUT_P16 -DAC_OUT_N16
differential pair DAC_OUT15: +DAC_OUT_P15 -DAC_OUT_N15
differential pair DAC_OUT14: +DAC_OUT_P14 -DAC_OUT_N14
differential pair DAC_OUT13: +DAC_OUT_P13 -DAC_OUT_N13
differential pair DAC_OUT12: +DAC_OUT_P12 -DAC_OUT_N12
differential pair DAC_OUT11: +DAC_OUT_P11 -DAC_OUT_N11
differential pair DAC_OUT10: +DAC_OUT_P10 -DAC_OUT_N10
differential pair DAC_OUT9: +DAC_OUT_P9 -DAC_OUT_N9
differential pair DAC_OUT8: +DAC_OUT_P8 -DAC_OUT_N8
differential pair DAC_OUT7: +DAC_OUT_P7 -DAC_OUT_N7
differential pair DAC_OUT6: +DAC_OUT_P6 -DAC_OUT_N6
differential pair DAC_OUT5: +DAC_OUT_P5 -DAC_OUT_N5
differential pair DAC_OUT4: +DAC_OUT_P4 -DAC_OUT_N4
differential pair DAC_OUT3: +DAC_OUT_P3 -DAC_OUT_N3
differential pair DAC_OUT2: +DAC_OUT_P2 -DAC_OUT_N2
differential pair DAC_OUT1: +DAC_OUT_P1 -DAC_OUT_N1
differential pair BP_IO.LVDS7: +BP_IO.LVDS_P7 -BP_IO.LVDS_N7
differential pair BP_IO.LVDS6: +BP_IO.LVDS_P6 -BP_IO.LVDS_N6
differential pair BP_IO.LVDS5: +BP_IO.LVDS_P5 -BP_IO.LVDS_N5
differential pair BP_IO.LVDS4: +BP_IO.LVDS_P4 -BP_IO.LVDS_N4
differential pair BP_IO.LVDS3: +BP_IO.LVDS_P3 -BP_IO.LVDS_N3
differential pair BP_IO.LVDS2: +BP_IO.LVDS_P2 -BP_IO.LVDS_N2
differential pair BP_IO.LVDS1: +BP_IO.LVDS_P1 -BP_IO.LVDS_N1
differential pair BP_IO.LVDS0: +BP_IO.LVDS_P0 -BP_IO.LVDS_N0
differential pair DAC_IN32: +DAC_IN_P32 -DAC_IN_N32
differential pair DAC_IN31: +DAC_IN_P31 -DAC_IN_N31
differential pair DAC_IN30: +DAC_IN_P30 -DAC_IN_N30
differential pair DAC_IN29: +DAC_IN_P29 -DAC_IN_N29
differential pair DAC_IN28: +DAC_IN_P28 -DAC_IN_N28
differential pair DAC_IN27: +DAC_IN_P27 -DAC_IN_N27
differential pair DAC_IN26: +DAC_IN_P26 -DAC_IN_N26
differential pair DAC_IN25: +DAC_IN_P25 -DAC_IN_N25
differential pair DAC_IN24: +DAC_IN_P24 -DAC_IN_N24
differential pair DAC_IN23: +DAC_IN_P23 -DAC_IN_N23
differential pair DAC_IN22: +DAC_IN_P22 -DAC_IN_N22
differential pair DAC_IN21: +DAC_IN_P21 -DAC_IN_N21
differential pair DAC_IN20: +DAC_IN_P20 -DAC_IN_N20
differential pair DAC_IN19: +DAC_IN_P19 -DAC_IN_N19
differential pair DAC_IN18: +DAC_IN_P18 -DAC_IN_N18
differential pair DAC_IN17: +DAC_IN_P17 -DAC_IN_N17
differential pair DAC_IN16: +DAC_IN_P16 -DAC_IN_N16
differential pair DAC_IN15: +DAC_IN_P15 -DAC_IN_N15
differential pair DAC_IN14: +DAC_IN_P14 -DAC_IN_N14
differential pair DAC_IN13: +DAC_IN_P13 -DAC_IN_N13
differential pair DAC_IN12: +DAC_IN_P12 -DAC_IN_N12
differential pair DAC_IN11: +DAC_IN_P11 -DAC_IN_N11
differential pair DAC_IN10: +DAC_IN_P10 -DAC_IN_N10
differential pair DAC_IN9: +DAC_IN_P9 -DAC_IN_N9
differential pair DAC_IN8: +DAC_IN_P8 -DAC_IN_N8
differential pair DAC_IN7: +DAC_IN_P7 -DAC_IN_N7
differential pair DAC_IN6: +DAC_IN_P6 -DAC_IN_N6
differential pair DAC_IN5: +DAC_IN_P5 -DAC_IN_N5
differential pair DAC_IN4: +DAC_IN_P4 -DAC_IN_N4
differential pair DAC_IN3: +DAC_IN_P3 -DAC_IN_N3
differential pair DAC_IN2: +DAC_IN_P2 -DAC_IN_N2
differential pair DAC_IN1: +DAC_IN_P1 -DAC_IN_N1
differential pair EEM0_7: +EEM0_7_P -EEM0_7_N
differential pair EEM0_6: +EEM0_6_P -EEM0_6_N
differential pair EEM0_5: +EEM0_5_P -EEM0_5_N
differential pair EEM0_4: +EEM0_4_P -EEM0_4_N
differential pair EEM0_3: +EEM0_3_P -EEM0_3_N
differential pair EEM0_2: +EEM0_2_P -EEM0_2_N
differential pair EEM0_1: +EEM0_1_P -EEM0_1_N
differential pair EEM0_0: +EEM0_0_P -EEM0_0_N

## Components (designator, comment, footprint, x,y, rotation, side; value= is the part's Value field where it differs from the comment)
B1 "Plated Hole" MTG270_500 3.556,94.412 r0 top
B7 "Plated Hole" MTG270_500 3.556,5.512 r0 top
C1 "100nF" CAPC1608X87N 180.701,55.1 r0 top
C2 "100nF" CAPC1608X87N 178.05,74.6 r90 top
C3 "100nF" CAPC1608X87N 196.25,73.45 r90 top
C4 "100nF" CAPC1608X87N 175.2,7.2 r270 top
C5 "100nF" CAPC1608X87N 202.175,96.6 r0 top
C6 "100nF" CAPC1608X87N 211.512,96.6 r0 top
C7 "100nF" CAPC1608X87N 195.95,96.6 r180 top
C8 "100nF" CAPC1608X87N 180.701,57.595 r0 top
C9 "100nF" CAPC1608X87N 187.25,73.65 r90 top
C10 "100nF" CAPC1608X87N 180.701,44.97 r0 top
C11 "100nF" CAPC1608X87N 144.2,4.3 r0 top
C12 "22uF" CAPC2012X135N 153.675,6.7 r180 top
C13 "22uF" CAPC2012X135N 140.9,4.4 r180 top
C14 "22uF" CAPC2012X135N 140.9,7.7 r180 top
C15 "22uF" CAPC2012X135N 153.675,8.6 r180 top
C16 "22uF" CAPC2012X135N 136,12.2 r180 top
C17 "22uF" CAPC2012X135N 136,10.1 r180 top
C18A "100nF" CAPC1608X87N 159.3,73.5 r0 top (schematic designator C18)
C18B "100nF" CAPC1608X87N 159.4,61.5 r0 top (schematic designator C18)
C19A "100nF" CAPC1608X87N 159.4,49.8 r0 top (schematic designator C19)
C19B "100nF" CAPC1608X87N 140,73.6 r0 top (schematic designator C19)
C20A "100nF" CAPC1608X87N 159.3,37.4 r0 top (schematic designator C20)
C20B "100nF" CAPC1608X87N 139.9,61.4 r0 top (schematic designator C20)
C21A "100nF" CAPC1608X87N 139.9,49.4 r0 top (schematic designator C21)
C21B "100nF" CAPC1608X87N 139.9,37.2 r0 top (schematic designator C21)
C22 "100nF" CAPC1608X87N 182.299,7.2 r270 top
C23 "4.7uF" CAPMP3216X180N 194.2,16.7 r0 top
C24 "100nF" CAPC1608X87N 189.35,7.2 r270 top
C25 "22uF" CAPC2012X135N 180.551,28.435 r0 top
C26 "100nF" CAPC1608X87N 180.551,26.545 r0 top
C27 "100nF" CAPC1608X87N 180.551,30.355 r0 top
C28 "1uF" CAPC1608X87N 184.8,24 r270 top
C29 "100nF" CAPC1608X87N 148.092,7.735 r0 top
C30 "100nF" CAPC1608X87N 151.8,4.4 r180 top
C31 "100nF" CAPC1608X87N 150.1,9.3 r180 top
C32 "100nF" CAPC1608X87N 152.53,11.15 r90 top
C33 "2.2uF" CAPC1005X55N 150.19,15.095 r180 top
C38 "100nF" CAPC1608X87N 180.551,32.355 r0 top
C40 "1uF" CAPC1608X87N 194.2,10.6 r180 top
C47 "100nF" CAPC1608X87N 82.6,96.6 r180 top
C58 "100nF" CAPC1608X87N 180.701,38.66 r0 top
C93 "100nF" CAPC1608X87N 166.938,7.793 r0 top
C102 "100nF" CAPC1608X87N 164.438,11.482 r270 top
C110 "22uF" CAPC2012X135N 162.775,6.008 r180 top
C121 "22uF" CAPC2012X135N 162.775,8.108 r180 top
C123 "22uF" CAPC2012X135N 166.938,6.008 r0 top
C212 "22pF" CAPC1005X55N 7.4,7.2 r90 top
D1 "PRTR5V0U2X" SOT190P230X110-4N 192.4,35.8 r180 top
D2 "BAT165" SOD2512X110N 177.4,28 r270 top
D3 "BAT165" SOD2512X110N 185.9,96.6 r180 top
D4 "PRTR5V0U2X" SOT190P230X110-4N 192.4,19.9 r180 top
D5 "PRTR5V0U2X" SOT190P230X110-4N 192.4,23.7 r180 top
D6 "PRTR5V0U2X" SOT190P230X110-4N 188.1,19.9 r180 top
D7 "PRTR5V0U2X" SOT190P230X110-4N 184,19.9 r180 top
D8 "CDBU0520-HF" SOD-523F 188.2,24 r90 top
D9 "CDBU0520-HF" SOD-523F 186.6,24 r90 top
D10 "SMBJ12A" DIOM5336X265N 194.2,6.15 r90 top
D11 "BAT165" SOD2512X110N 175.4,28 r270 top
D12A "BAT165" SOD2512X110N 24.178,5.76 r180 bottom (schematic designator D12)
D12AA "BAT165" SOD2512X110N 45.014,72.912 r180 bottom (schematic designator D12)
D12AB "BAT165" SOD2512X110N 86.686,72.912 r180 bottom (schematic designator D12)
D12AC "BAT165" SOD2512X110N 24.178,84.104 r180 bottom (schematic designator D12)
D12AD "BAT165" SOD2512X110N 65.85,84.104 r180 bottom (schematic designator D12)
D12AE "BAT165" SOD2512X110N 45.014,84.104 r180 bottom (schematic designator D12)
D12AF "BAT165" SOD2512X110N 86.686,84.104 r180 bottom (schematic designator D12)
D12B "BAT165" SOD2512X110N 65.85,5.76 r180 bottom (schematic designator D12)
D12C "BAT165" SOD2512X110N 45.014,5.76 r180 bottom (schematic designator D12)
D12D "BAT165" SOD2512X110N 86.686,5.76 r180 bottom (schematic designator D12)
D12E "BAT165" SOD2512X110N 24.178,16.952 r180 bottom (schematic designator D12)
D12F "BAT165" SOD2512X110N 65.85,16.952 r180 bottom (schematic designator D12)
D12G "BAT165" SOD2512X110N 45.014,16.952 r180 bottom (schematic designator D12)
D12H "BAT165" SOD2512X110N 86.686,16.952 r180 bottom (schematic designator D12)
D12I "BAT165" SOD2512X110N 24.178,28.144 r180 bottom (schematic designator D12)
D12J "BAT165" SOD2512X110N 65.85,28.144 r180 bottom (schematic designator D12)
D12K "BAT165" SOD2512X110N 45.014,28.144 r180 bottom (schematic designator D12)
D12L "BAT165" SOD2512X110N 86.686,28.144 r180 bottom (schematic designator D12)
D12M "BAT165" SOD2512X110N 24.178,39.336 r180 bottom (schematic designator D12)
D12N "BAT165" SOD2512X110N 65.85,39.336 r180 bottom (schematic designator D12)
D12O "BAT165" SOD2512X110N 45.014,39.336 r180 bottom (schematic designator D12)
D12P "BAT165" SOD2512X110N 86.686,39.336 r180 bottom (schematic designator D12)
D12Q "BAT165" SOD2512X110N 24.178,50.528 r180 bottom (schematic designator D12)
D12R "BAT165" SOD2512X110N 65.85,50.528 r180 bottom (schematic designator D12)
D12S "BAT165" SOD2512X110N 45.014,50.528 r180 bottom (schematic designator D12)
D12T "BAT165" SOD2512X110N 86.686,50.528 r180 bottom (schematic designator D12)
D12U "BAT165" SOD2512X110N 24.178,61.72 r180 bottom (schematic designator D12)
D12V "BAT165" SOD2512X110N 65.85,61.72 r180 bottom (schematic designator D12)
D12W "BAT165" SOD2512X110N 45.014,61.72 r180 bottom (schematic designator D12)
D12X "BAT165" SOD2512X110N 86.686,61.72 r180 bottom (schematic designator D12)
D12Y "BAT165" SOD2512X110N 24.178,72.912 r180 bottom (schematic designator D12)
D12Z "BAT165" SOD2512X110N 65.85,72.912 r180 bottom (schematic designator D12)
D13A "BAT165" SOD2512X110N 24.178,11.356 r180 bottom (schematic designator D13)
D13AA "BAT165" SOD2512X110N 45.014,78.508 r180 bottom (schematic designator D13)
D13AB "BAT165" SOD2512X110N 86.686,78.508 r180 bottom (schematic designator D13)
D13AC "BAT165" SOD2512X110N 24.178,89.7 r180 bottom (schematic designator D13)
D13AD "BAT165" SOD2512X110N 65.85,89.7 r180 bottom (schematic designator D13)
D13AE "BAT165" SOD2512X110N 45.014,89.7 r180 bottom (schematic designator D13)
D13AF "BAT165" SOD2512X110N 86.686,89.7 r180 bottom (schematic designator D13)
D13B "BAT165" SOD2512X110N 65.85,11.356 r180 bottom (schematic designator D13)
D13C "BAT165" SOD2512X110N 45.014,11.356 r180 bottom (schematic designator D13)
D13D "BAT165" SOD2512X110N 86.686,11.356 r180 bottom (schematic designator D13)
D13E "BAT165" SOD2512X110N 24.178,22.548 r180 bottom (schematic designator D13)
D13F "BAT165" SOD2512X110N 65.85,22.548 r180 bottom (schematic designator D13)
D13G "BAT165" SOD2512X110N 45.014,22.548 r180 bottom (schematic designator D13)
D13H "BAT165" SOD2512X110N 86.686,22.548 r180 bottom (schematic designator D13)
D13I "BAT165" SOD2512X110N 24.178,33.74 r180 bottom (schematic designator D13)
D13J "BAT165" SOD2512X110N 65.85,33.74 r180 bottom (schematic designator D13)
D13K "BAT165" SOD2512X110N 45.014,33.74 r180 bottom (schematic designator D13)
D13L "BAT165" SOD2512X110N 86.686,33.74 r180 bottom (schematic designator D13)
D13M "BAT165" SOD2512X110N 24.178,44.932 r180 bottom (schematic designator D13)
D13N "BAT165" SOD2512X110N 65.85,44.932 r180 bottom (schematic designator D13)
D13O "BAT165" SOD2512X110N 45.014,44.932 r180 bottom (schematic designator D13)
D13P "BAT165" SOD2512X110N 86.686,44.932 r180 bottom (schematic designator D13)
D13Q "BAT165" SOD2512X110N 24.178,56.124 r180 bottom (schematic designator D13)
D13R "BAT165" SOD2512X110N 65.85,56.124 r180 bottom (schematic designator D13)
D13S "BAT165" SOD2512X110N 45.014,56.124 r180 bottom (schematic designator D13)
D13T "BAT165" SOD2512X110N 86.686,56.124 r180 bottom (schematic designator D13)
D13U "BAT165" SOD2512X110N 24.178,67.316 r180 bottom (schematic designator D13)
D13V "BAT165" SOD2512X110N 65.85,67.316 r180 bottom (schematic designator D13)
D13W "BAT165" SOD2512X110N 45.014,67.316 r180 bottom (schematic designator D13)
D13X "BAT165" SOD2512X110N 86.686,67.316 r180 bottom (schematic designator D13)
D13Y "BAT165" SOD2512X110N 24.178,78.508 r180 bottom (schematic designator D13)
D13Z "BAT165" SOD2512X110N 65.85,78.508 r180 bottom (schematic designator D13)
FTG1 "Use only in PCB" FIDUCIAL_TOP_C100-200 217.6,96.3 r90 bottom
FTG2 "Use only in PCB" FIDUCIAL_TOP_S100-200 217.6,96.3 r90 top
FTG3 "Use only in PCB" FIDUCIAL_TOP_S100-200 12,4.8 r90 bottom
FTG4 "Use only in PCB" FIDUCIAL_TOP_S100-200 12,4.8 r90 top
IC1 "74HC4053D" SOIC127P600X175-16N 173.25,70.25 r0 top
IC2 "FIN1028MX" SOIC127P600X175-8N 186.051,59.5 r180 top
IC3 "FIN1027AMX" SOIC127P600X175-8N 186.051,53.19 r0 top
IC4 "FIN1028MX" SOIC127P600X175-8N 186.051,46.88 r180 top
IC5 "FIN1028MX" SOIC127P600X175-8N 186.051,40.57 r180 top
IC6 "SN74HC125D" SOIC127P600X175-14N 191.75,70.25 r0 top
IC7A "SN74LV595APWT" SOP65P640X120-16N 142.175,55.8 r90 top (schematic designator IC7)
IC7B "SN74LV595APWT" SOP65P640X120-16N 161.75,55.85 r90 top (schematic designator IC7)
IC8 "74HC4053D" SOIC127P600X175-16N 182.75,70.25 r0 top
IC9A "SN74LV595APWT" SOP65P640X120-16N 142.175,67.8 r90 top (schematic designator IC9)
IC9B "SN74LV595APWT" SOP65P640X120-16N 161.75,67.85 r90 top (schematic designator IC9)
IC10A "SN74LV595APWT" SOP65P640X120-16N 142.175,31.75 r90 top (schematic designator IC10)
IC10B "SN74LV595APWT" SOP65P640X120-16N 161.75,31.8 r90 top (schematic designator IC10)
IC11A "SN74LV595APWT" SOP65P640X120-16N 142.175,43.8 r90 top (schematic designator IC11)
IC11B "SN74LV595APWT" SOP65P640X120-16N 161.75,43.85 r90 top (schematic designator IC11)
IC12 "74HC4066PW" SOP65P640X110-14N 171.66,9.548 r270 top
IC13 "LM75AIMM/NOPB" SOP65P490X109-8N 77.7,95.5 r0 top
IC14 "MIC5219-3.3YM5" SOT95P280X145-5N 194.2,13.5 r90 top
IC15 "24AA02E48-I/SN" SOIC127P600X175-8N 186.051,34.26 r180 top
IC16 "74HC4066PW" SOP65P640X110-14N 178.759,9.548 r270 top
IC17 "74HC4066PW" SOP65P640X110-14N 185.858,9.531 r270 top
IC18 "TLC555ID" SOIC127P600X175-8N 186.051,28.45 r180 top
IC19 "TPS62148RGX" TEXAS_RGX0011A 148.092,5.325 r270 top
IC20 "LTC3624EDD-2" SON50P300X300X80-9N-R175X248 149.27,12.25 r90 top
IC22 "AP62201WU-7" SOT95P280X100-6N 166.938,10.832 r90 top
IC32 "24AA02E48T-I/OT" SOT95P280X145-5N 186.05,34.261 r270 top
J1 "D-SUB" TYCO_5787082-7 4.037,42.806 r270 top locked
J2 "MCX" AMPHENOL_919-383J-51A 1.5,79.1 r180 top locked
J3 "MCX" AMPHENOL_919-383J-51A 1.5,87.4 r180 top locked
J4 "Header 26" 3M_N2526-6002RB 121.288,30.556 r90 top locked
J5 "Header 26" 3M_N2526-6002RB 121.288,71.556 r90 top locked
J6 "" 3M_N2530-6002RB 200.48,42.33 r270 top locked
J7 "Header 26" 3M_N2526-6002RB 107.788,71.556 r90 top locked
J8 "Header 26" 3M_N2526-6002RB 107.788,30.556 r90 top locked
J9 "Coax_1Female_1Shield" SAMTEC_MCX-J-P-H-ST-TH1 10.5,79.1 r90 top
J10 "Mini-Fit Jr.™" MOLEX_39-30-0040 203.65,70.8 r270 top
J11 "Socket 15" SAMTEC_SSW-115-01-X-S 196.25,93.87 r180 top locked
J12 "Coax_1Female_1Shield" SAMTEC_MCX-J-P-H-ST-TH1 10.5,87.4 r0 top
J13 "P1" AMPHENOL_10052825-101LF 210.35,9.5 r90 top locked
J14 "Socket 15" SAMTEC_SSW-115-01-X-S 196.25,78.63 r0 top locked
L1 "1.5uH" IND_TDK_SPM6530 143.217,12.293 r180 top
L2 "3.3uH" IND_WURTH_WE-TPC_4828 136.175,5.957 r180 top
L7 "3.3uH" IND_WURTH_WE-TPC_4828 160.6,12.293 r180 top
LD1 "Green" LED_AVAGO_HSME-C110 -1,68.6 r270 bottom locked
LD2A "Green" LED_KINGBRIGHT_KP-1608CGCK 136.175,27 r180 top (schematic designator LD2)
LD2B "Green" LED_KINGBRIGHT_KP-1608CGCK 155.75,27.05 r180 top (schematic designator LD2)
LD3A "Green" LED_KINGBRIGHT_KP-1608CGCK 136.175,28.5 r180 top (schematic designator LD3)
LD3B "Green" LED_KINGBRIGHT_KP-1608CGCK 155.75,28.55 r180 top (schematic designator LD3)
LD4 "Green" LED_KINGBRIGHT_KPH-1608CGCK 151.4,78.667 r0 top
LD5A "Green" LED_KINGBRIGHT_KP-1608CGCK 136.175,30 r180 top (schematic designator LD5)
LD5B "Green" LED_KINGBRIGHT_KP-1608CGCK 155.75,30.05 r180 top (schematic designator LD5)
LD6A "Green" LED_KINGBRIGHT_KP-1608CGCK 136.175,31.5 r180 top (schematic designator LD6)
LD6B "Green" LED_KINGBRIGHT_KP-1608CGCK 155.75,31.55 r180 top (schematic designator LD6)
LD7A "Green" LED_KINGBRIGHT_KP-1608CGCK 136.175,33 r180 top (schematic designator LD7)
LD7B "Green" LED_KINGBRIGHT_KP-1608CGCK 155.75,33.05 r180 top (schematic designator LD7)
LD8A "Green" LED_KINGBRIGHT_KP-1608CGCK 136.175,34.5 r180 top (schematic designator LD8)
LD8B "Green" LED_KINGBRIGHT_KP-1608CGCK 155.75,34.55 r180 top (schematic designator LD8)
LD9A "Green" LED_KINGBRIGHT_KP-1608CGCK 136.175,36 r180 top (schematic designator LD9)
LD9B "Green" LED_KINGBRIGHT_KP-1608CGCK 155.75,36.05 r180 top (schematic designator LD9)
LD10 "Red" LED_AVAGO_HSMC-C110 -1,16.9 r270 bottom locked
LD11 "Green" LED_KINGBRIGHT_KPH-1608CGCK 151.4,83.533 r0 top
LD12A "Green" LED_KINGBRIGHT_KP-1608CGCK 136.175,37.5 r180 top (schematic designator LD12)
LD12B "Green" LED_KINGBRIGHT_KP-1608CGCK 155.75,37.55 r180 top (schematic designator LD12)
LD13A "Green" LED_KINGBRIGHT_KP-1608CGCK 136.175,39 r180 top (schematic designator LD13)
LD13B "Green" LED_KINGBRIGHT_KP-1608CGCK 155.75,39.05 r180 top (schematic designator LD13)
LD14A "Green" LED_KINGBRIGHT_KP-1608CGCK 136.4,40.45 r180 top (schematic designator LD14)
LD14B "Green" LED_KINGBRIGHT_KP-1608CGCK 155.975,40.5 r180 top (schematic designator LD14)
LD15A "Green" LED_KINGBRIGHT_KP-1608CGCK 136.175,42 r180 top (schematic designator LD15)
LD15B "Green" LED_KINGBRIGHT_KP-1608CGCK 155.75,42.05 r180 top (schematic designator LD15)
LD16A "Green" LED_KINGBRIGHT_KP-1608CGCK 136.175,43.5 r180 top (schematic designator LD16)
LD16B "Green" LED_KINGBRIGHT_KP-1608CGCK 155.75,43.55 r180 top (schematic designator LD16)
LD17A "Green" LED_KINGBRIGHT_KP-1608CGCK 136.175,45 r180 top (schematic designator LD17)
LD17B "Green" LED_KINGBRIGHT_KP-1608CGCK 155.75,45.05 r180 top (schematic designator LD17)
LD18A "Green" LED_KINGBRIGHT_KP-1608CGCK 136.175,46.5 r180 top (schematic designator LD18)
LD18B "Green" LED_KINGBRIGHT_KP-1608CGCK 155.75,46.55 r180 top (schematic designator LD18)
LD19A "Green" LED_KINGBRIGHT_KP-1608CGCK 136.175,48 r180 top (schematic designator LD19)
LD19B "Green" LED_KINGBRIGHT_KP-1608CGCK 155.75,48.05 r180 top (schematic designator LD19)
LD20A "Green" LED_KINGBRIGHT_KP-1608CGCK 136.175,49.55 r180 top (schematic designator LD20)
LD20B "Green" LED_KINGBRIGHT_KP-1608CGCK 155.75,49.6 r180 top (schematic designator LD20)
LD21A "Green" LED_KINGBRIGHT_KP-1608CGCK 136.175,51.05 r180 top (schematic designator LD21)
LD21B "Green" LED_KINGBRIGHT_KP-1608CGCK 155.75,51.1 r180 top (schematic designator LD21)
LD22A "Green" LED_KINGBRIGHT_KP-1608CGCK 136.175,52.55 r180 top (schematic designator LD22)
LD22B "Green" LED_KINGBRIGHT_KP-1608CGCK 155.75,52.6 r180 top (schematic designator LD22)
LD23A "Green" LED_KINGBRIGHT_KP-1608CGCK 136.175,54.05 r180 top (schematic designator LD23)
LD23B "Green" LED_KINGBRIGHT_KP-1608CGCK 155.75,54.1 r180 top (schematic designator LD23)
LD24A "Green" LED_KINGBRIGHT_KP-1608CGCK 136.175,55.55 r180 top (schematic designator LD24)
LD24B "Green" LED_KINGBRIGHT_KP-1608CGCK 155.75,55.6 r180 top (schematic designator LD24)
LD25A "Green" LED_KINGBRIGHT_KP-1608CGCK 136.175,57.05 r180 top (schematic designator LD25)
LD25B "Green" LED_KINGBRIGHT_KP-1608CGCK 155.75,57.1 r180 top (schematic designator LD25)
LD26A "Green" LED_KINGBRIGHT_KP-1608CGCK 136.175,58.55 r180 top (schematic designator LD26)
LD26B "Green" LED_KINGBRIGHT_KP-1608CGCK 155.75,58.6 r180 top (schematic designator LD26)
LD27A "Green" LED_KINGBRIGHT_KP-1608CGCK 136.175,60.05 r180 top (schematic designator LD27)
LD27B "Green" LED_KINGBRIGHT_KP-1608CGCK 155.75,60.1 r180 top (schematic designator LD27)
LD28A "Green" LED_KINGBRIGHT_KP-1608CGCK 136.175,61.55 r180 top (schematic designator LD28)
LD28B "Green" LED_KINGBRIGHT_KP-1608CGCK 155.75,61.6 r180 top (schematic designator LD28)
LD29A "Green" LED_KINGBRIGHT_KP-1608CGCK 136.175,63.05 r180 top (schematic designator LD29)
LD29B "Green" LED_KINGBRIGHT_KP-1608CGCK 155.75,63.1 r180 top (schematic designator LD29)
LD30A "Green" LED_KINGBRIGHT_KP-1608CGCK 136.175,64.55 r180 top (schematic designator LD30)
LD30B "Green" LED_KINGBRIGHT_KP-1608CGCK 155.75,64.6 r180 top (schematic designator LD30)
LD31A "Green" LED_KINGBRIGHT_KP-1608CGCK 136.175,66.05 r180 top (schematic designator LD31)
LD31B "Green" LED_KINGBRIGHT_KP-1608CGCK 155.75,66.1 r180 top (schematic designator LD31)
LD32A "Green" LED_KINGBRIGHT_KP-1608CGCK 136.2,67.6 r180 top (schematic designator LD32)
LD32B "Green" LED_KINGBRIGHT_KP-1608CGCK 155.775,67.65 r180 top (schematic designator LD32)
LD33A "Green" LED_KINGBRIGHT_KP-1608CGCK 136.175,69.05 r180 top (schematic designator LD33)
LD33B "Green" LED_KINGBRIGHT_KP-1608CGCK 155.75,69.1 r180 top (schematic designator LD33)
LD34A "Green" LED_KINGBRIGHT_KP-1608CGCK 136.175,70.55 r180 top (schematic designator LD34)
LD34B "Green" LED_KINGBRIGHT_KP-1608CGCK 155.75,70.6 r180 top (schematic designator LD34)
LD35A "Green" LED_KINGBRIGHT_KP-1608CGCK 136.175,72.05 r180 top (schematic designator LD35)
LD35B "Green" LED_KINGBRIGHT_KP-1608CGCK 155.75,72.1 r180 top (schematic designator LD35)
LD36A "Green" LED_KINGBRIGHT_KP-1608CGCK 136.175,73.55 r180 top (schematic designator LD36)
LD36B "Green" LED_KINGBRIGHT_KP-1608CGCK 155.75,73.6 r180 top (schematic designator LD36)
LD37 "Green" LED_KINGBRIGHT_KPH-1608CGCK 151.4,81.1 r0 top
LD38 "Green" LED_KINGBRIGHT_KPH-1608CGCK 151.4,85.967 r0 top
PCBM1 "ARDUINO NANO RP2040" "PCBM_ARDUINO NANO RP2040" 196.25,86.25 r180 top
Q1A "BC847BS" SOT65P210X110-6N 23.527,8.534 r90 bottom (schematic designator Q1)
Q1AA "BC847BS" SOT65P210X110-6N 44.363,75.686 r90 bottom (schematic designator Q1)
Q1AB "BC847BS" SOT65P210X110-6N 86.035,75.686 r90 bottom (schematic designator Q1)
Q1AC "BC847BS" SOT65P210X110-6N 23.527,86.878 r90 bottom (schematic designator Q1)
Q1AD "BC847BS" SOT65P210X110-6N 65.199,86.878 r90 bottom (schematic designator Q1)
Q1AE "BC847BS" SOT65P210X110-6N 44.363,86.878 r90 bottom (schematic designator Q1)
Q1AF "BC847BS" SOT65P210X110-6N 86.035,86.939 r90 bottom (schematic designator Q1)
Q1B "BC847BS" SOT65P210X110-6N 65.199,8.534 r90 bottom (schematic designator Q1)
Q1C "BC847BS" SOT65P210X110-6N 44.363,8.534 r90 bottom (schematic designator Q1)
Q1D "BC847BS" SOT65P210X110-6N 86.035,8.534 r90 bottom (schematic designator Q1)
Q1E "BC847BS" SOT65P210X110-6N 23.527,19.726 r90 bottom (schematic designator Q1)
Q1F "BC847BS" SOT65P210X110-6N 65.199,19.726 r90 bottom (schematic designator Q1)
Q1G "BC847BS" SOT65P210X110-6N 44.363,19.787 r90 bottom (schematic designator Q1)
Q1H "BC847BS" SOT65P210X110-6N 86.035,19.726 r90 bottom (schematic designator Q1)
Q1I "BC847BS" SOT65P210X110-6N 23.527,30.918 r90 bottom (schematic designator Q1)
Q1J "BC847BS" SOT65P210X110-6N 65.199,30.918 r90 bottom (schematic designator Q1)
Q1K "BC847BS" SOT65P210X110-6N 44.363,30.918 r90 bottom (schematic designator Q1)
Q1L "BC847BS" SOT65P210X110-6N 86.035,30.918 r90 bottom (schematic designator Q1)
Q1M "BC847BS" SOT65P210X110-6N 23.527,42.11 r90 bottom (schematic designator Q1)
Q1N "BC847BS" SOT65P210X110-6N 65.199,42.11 r90 bottom (schematic designator Q1)
Q1O "BC847BS" SOT65P210X110-6N 44.363,42.11 r90 bottom (schematic designator Q1)
Q1P "BC847BS" SOT65P210X110-6N 86.035,42.11 r90 bottom (schematic designator Q1)
Q1Q "BC847BS" SOT65P210X110-6N 23.527,53.302 r90 bottom (schematic designator Q1)
Q1R "BC847BS" SOT65P210X110-6N 65.199,53.302 r90 bottom (schematic designator Q1)
Q1S "BC847BS" SOT65P210X110-6N 44.363,53.302 r90 bottom (schematic designator Q1)
Q1T "BC847BS" SOT65P210X110-6N 86.035,53.302 r90 bottom (schematic designator Q1)
Q1U "BC847BS" SOT65P210X110-6N 23.527,64.494 r90 bottom (schematic designator Q1)
Q1V "BC847BS" SOT65P210X110-6N 65.199,64.494 r90 bottom (schematic designator Q1)
Q1W "BC847BS" SOT65P210X110-6N 44.363,64.494 r90 bottom (schematic designator Q1)
Q1X "BC847BS" SOT65P210X110-6N 86.035,64.494 r90 bottom (schematic designator Q1)
Q1Y "BC847BS" SOT65P210X110-6N 23.527,75.686 r90 bottom (schematic designator Q1)
Q1Z "BC847BS" SOT65P210X110-6N 65.199,75.686 r90 bottom (schematic designator Q1)
R1A "10k" RESC1608X55N 133.175,27 r0 top (schematic designator R1)
R1B "10k" RESC1608X55N 152.75,27.05 r0 top (schematic designator R1)
R2A "2k2" RESC1608X55N 130.175,27 r180 top (schematic designator R2)
R2B "2k2" RESC1608X55N 149.75,27.05 r180 top (schematic designator R2)
R3A "10k" RESC1608X55N 133.175,28.5 r0 top (schematic designator R3)
R3B "10k" RESC1608X55N 152.75,28.55 r0 top (schematic designator R3)
R4A "2k2" RESC1608X55N 130.175,28.5 r180 top (schematic designator R4)
R4B "2k2" RESC1608X55N 149.75,28.55 r180 top (schematic designator R4)
R5A "10k" RESC1608X55N 133.175,30 r0 top (schematic designator R5)
R5B "10k" RESC1608X55N 152.75,30.05 r0 top (schematic designator R5)
R6A "2k2" RESC1608X55N 130.175,30 r180 top (schematic designator R6)
R6B "2k2" RESC1608X55N 149.75,30.05 r180 top (schematic designator R6)
R7 "100" RESC1608X55N 190.75,58.129 r90 top
R8 "100" RESC1608X55N 180.701,59.197 r0 top
R9 "100" RESC1608X55N 190.75,61.129 r90 top
R10 "100" RESC1608X55N 180.701,60.8 r0 top
R11 "100" RESC1608X55N 180.701,53.497 r0 top
R12 "100" RESC1608X55N 190.75,45.509 r90 top
R13 "100" RESC1608X55N 180.701,46.572 r0 top
R14 "100" RESC1608X55N 190.75,48.509 r90 top
R15 "100" RESC1608X55N 180.7,48.2 r0 top
R16 "75k" RESC1608X55N 166.3,14.693 r90 top
R17 "1k" RESC1608X55N 180.701,41.205 r0 top
R18 "10k" RESC1608X55N 189.7,96.6 r180 top
R19 "10k" RESC1608X55N 199.037,96.6 r180 top
R20 "10k" RESC1608X55N 154.6,78.667 r180 top
R21A "10k" RESC1608X55N 133.15,40.45 r0 top (schematic designator R21)
R21B "10k" RESC1608X55N 152.725,40.5 r0 top (schematic designator R21)
R22A "2k2" RESC1608X55N 130.15,40.45 r180 top (schematic designator R22)
R22B "2k2" RESC1608X55N 149.725,40.5 r180 top (schematic designator R22)
R23 "62k" RESC1608X55N 145,6.6 r270 top
R24A "10k" RESC1608X55N 133.175,42 r0 top (schematic designator R24)
R24B "10k" RESC1608X55N 152.75,42.05 r0 top (schematic designator R24)
R25A "2k2" RESC1608X55N 130.175,42 r180 top (schematic designator R25)
R25B "2k2" RESC1608X55N 149.75,42.05 r180 top (schematic designator R25)
R26A "10k" RESC1608X55N 133.175,43.5 r0 top (schematic designator R26)
R26B "10k" RESC1608X55N 152.75,43.55 r0 top (schematic designator R26)
R27A "2k2" RESC1608X55N 130.175,43.5 r180 top (schematic designator R27)
R27B "2k2" RESC1608X55N 149.75,43.55 r180 top (schematic designator R27)
R28A "10k" RESC1608X55N 133.175,45 r0 top (schematic designator R28)
R28B "10k" RESC1608X55N 152.75,45.05 r0 top (schematic designator R28)
R29A "2k2" RESC1608X55N 130.175,45 r180 top (schematic designator R29)
R29B "2k2" RESC1608X55N 149.75,45.05 r180 top (schematic designator R29)
R30A "10k" RESC1608X55N 133.175,46.5 r0 top (schematic designator R30)
R30B "10k" RESC1608X55N 152.75,46.55 r0 top (schematic designator R30)
R31A "2k2" RESC1608X55N 130.175,46.5 r180 top (schematic designator R31)
R31B "2k2" RESC1608X55N 149.75,46.55 r180 top (schematic designator R31)
R32A "10k" RESC1608X55N 133.225,48 r0 top (schematic designator R32)
R32B "10k" RESC1608X55N 152.8,48.05 r0 top (schematic designator R32)
R33A "2k2" RESC1608X55N 130.175,48 r180 top (schematic designator R33)
R33B "2k2" RESC1608X55N 149.75,48.05 r180 top (schematic designator R33)
R34A "10k" RESC1608X55N 133.175,49.55 r0 top (schematic designator R34)
R34B "10k" RESC1608X55N 152.75,49.6 r0 top (schematic designator R34)
R35A "2k2" RESC1608X55N 130.175,49.55 r180 top (schematic designator R35)
R35B "2k2" RESC1608X55N 149.75,49.6 r180 top (schematic designator R35)
R36A "10k" RESC1608X55N 133.175,51.05 r0 top (schematic designator R36)
R36B "10k" RESC1608X55N 152.75,51.1 r0 top (schematic designator R36)
R37A "2k2" RESC1608X55N 130.175,51.05 r180 top (schematic designator R37)
R37B "2k2" RESC1608X55N 149.75,51.1 r180 top (schematic designator R37)
R38A "10k" RESC1608X55N 133.175,52.55 r0 top (schematic designator R38)
R38B "10k" RESC1608X55N 152.75,52.6 r0 top (schematic designator R38)
R39A "2k2" RESC1608X55N 130.175,52.55 r180 top (schematic designator R39)
R39B "2k2" RESC1608X55N 149.75,52.6 r180 top (schematic designator R39)
R40A "10k" RESC1608X55N 133.175,54.05 r0 top (schematic designator R40)
R40B "10k" RESC1608X55N 152.75,54.1 r0 top (schematic designator R40)